# Altium PCB PCB-PWR.PcbDoc (part 1 of 2)
Units mm, origin at the board's own origin, x right, y up, seen from the top; angles counter-clockwise.
Board outline 152.4 x 101.6 mm, 20 copper layers (F.Cu, F.Mask, B.Cu, B.Mask, In1.Cu, F.SilkS, In2.Cu, B.SilkS, F.Adhes, B.Adhes, F.Paste, B.Paste, Dwgs.User, Cmts.User, Eco1.User, Eco2.User, Edge.Cuts, Margin, B.CrtYd, F.CrtYd); 66 components, 31 nets, 210 pads, 267 vias.
Unrouted connection lines stored in the file: 6.
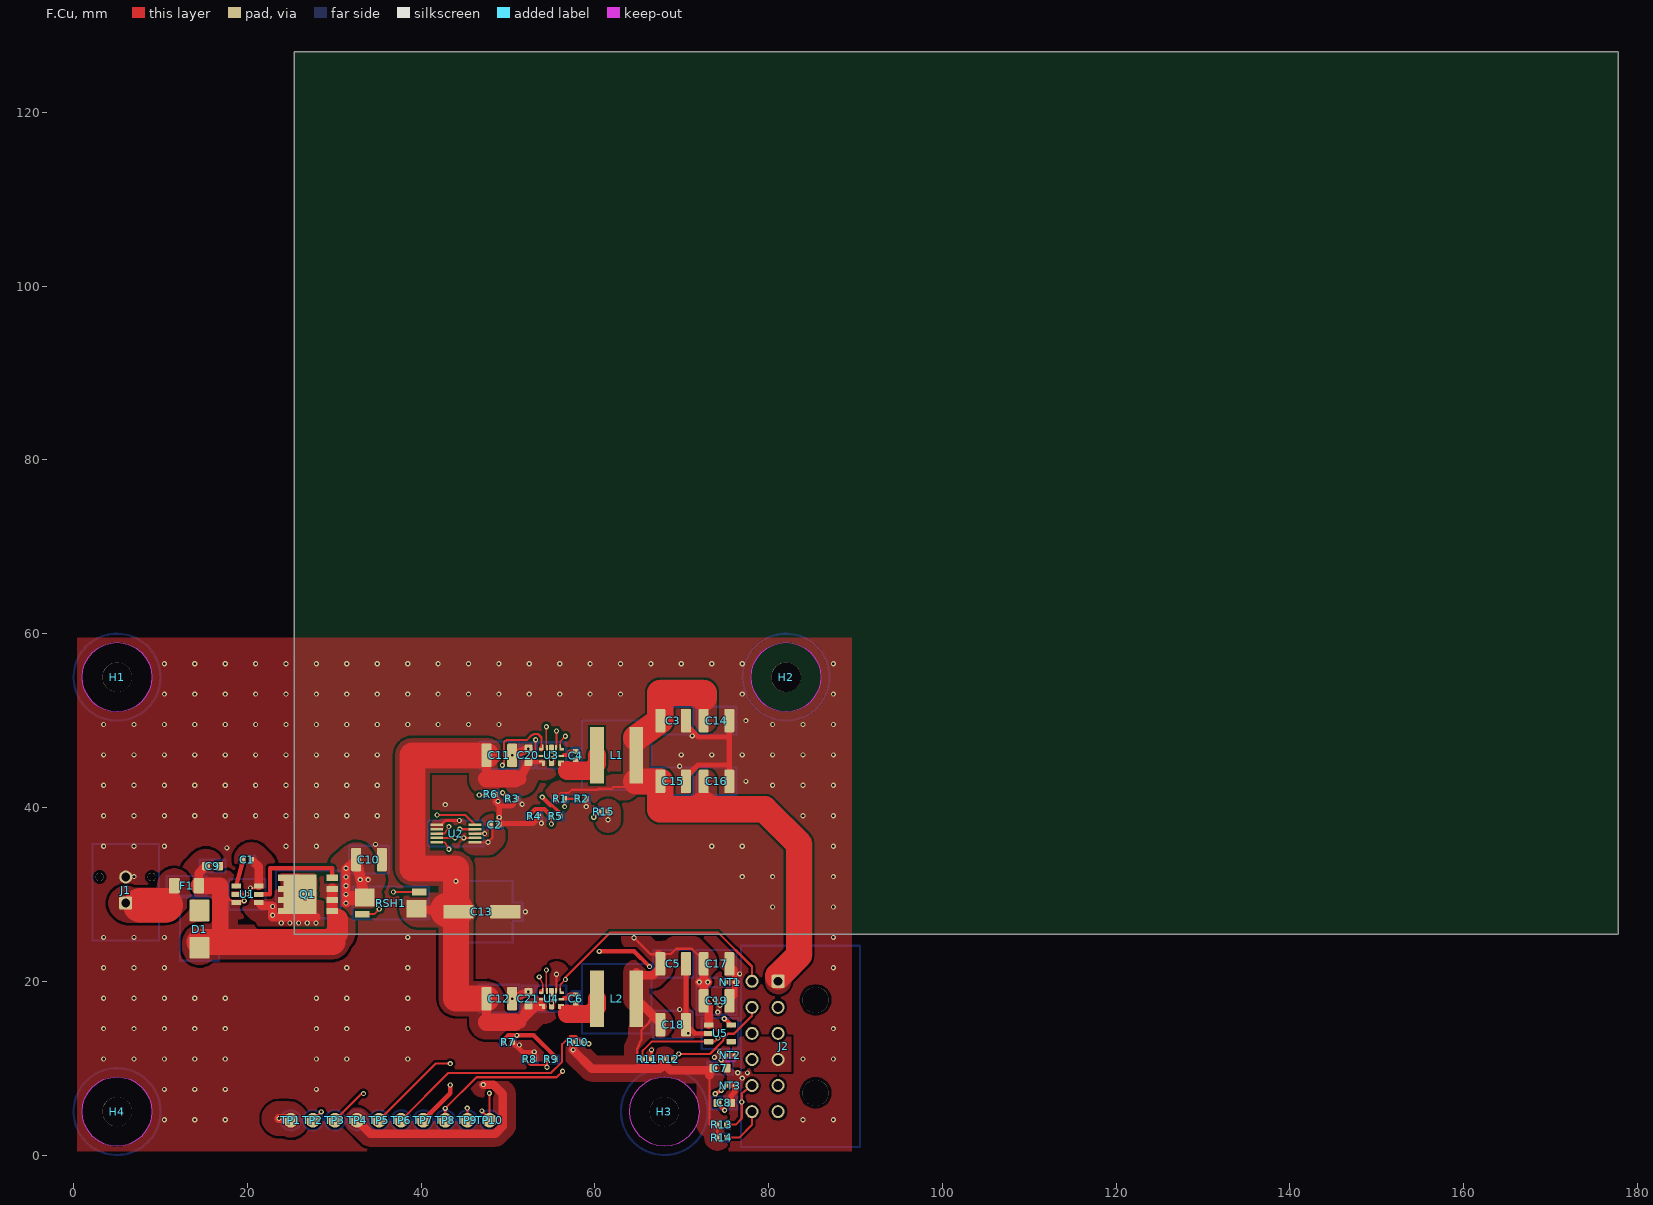
[diagram p0: F.Cu view]
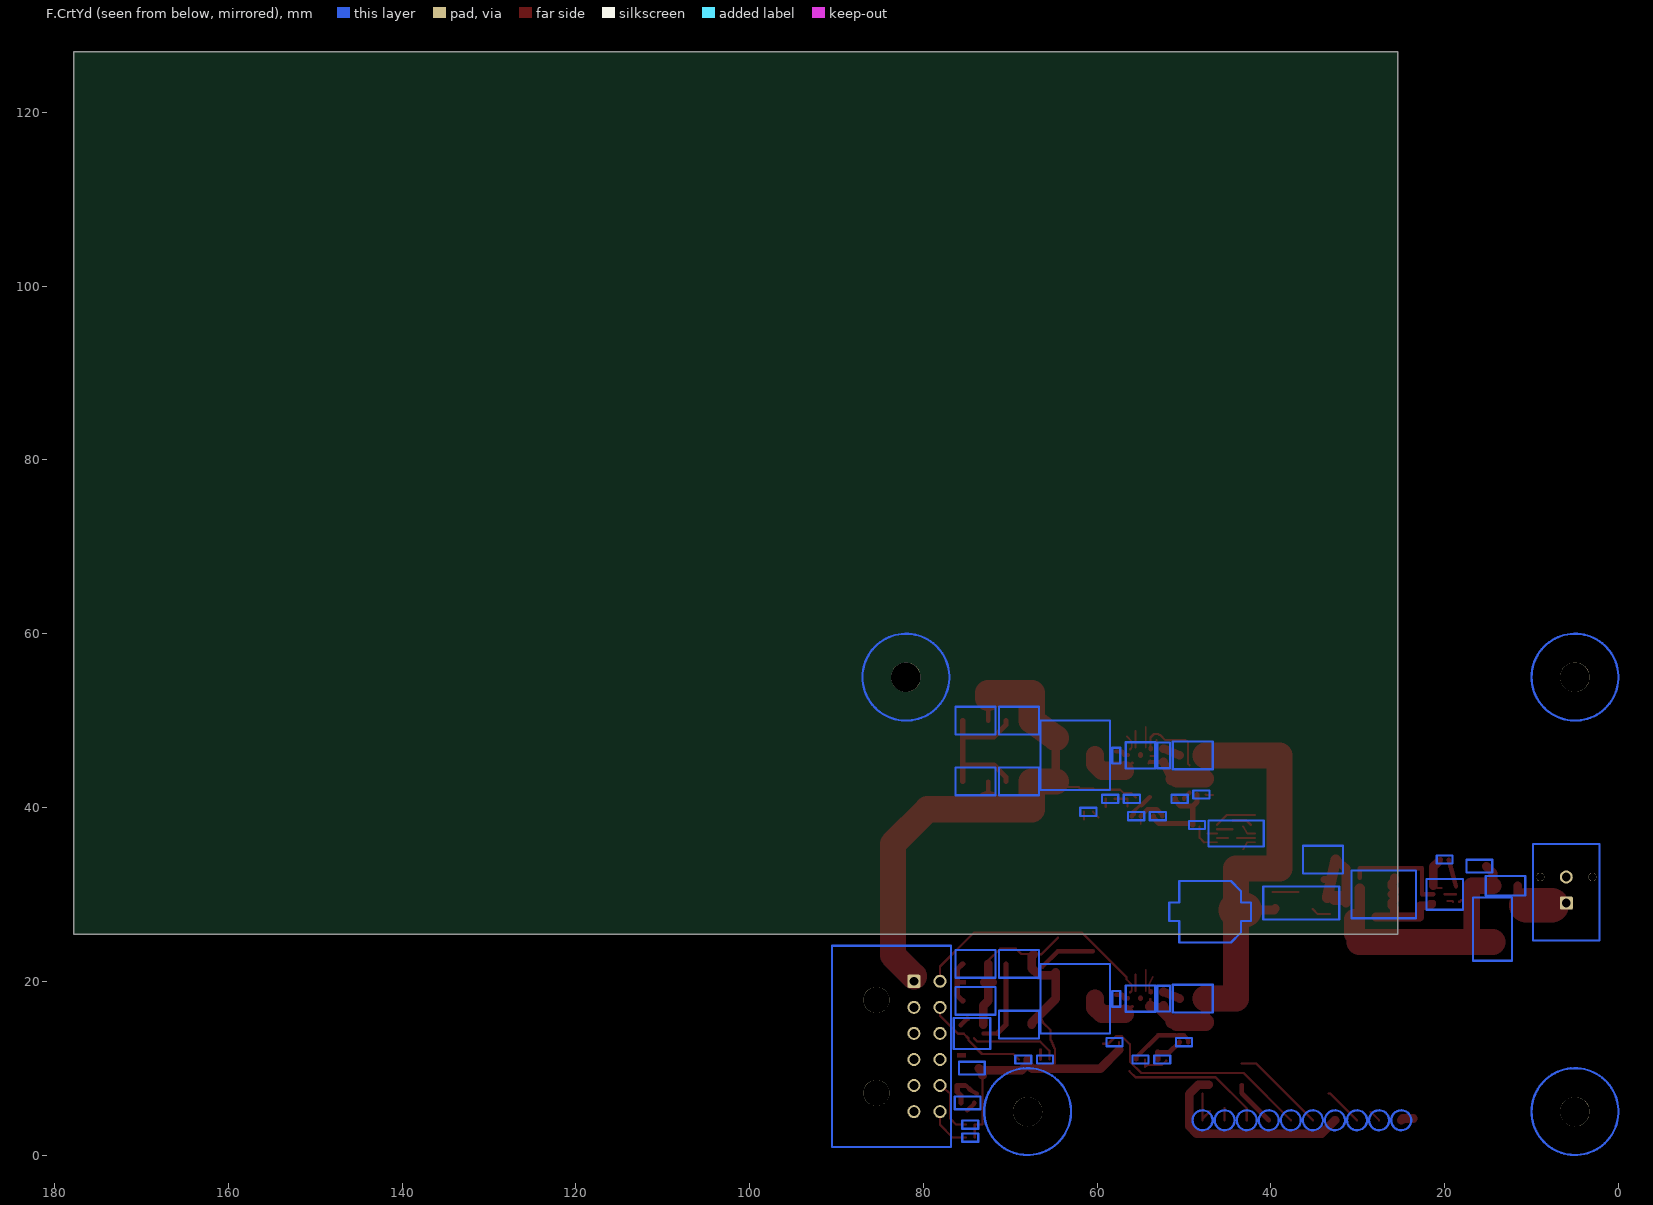
[diagram p1: F.CrtYd view, seen from below]
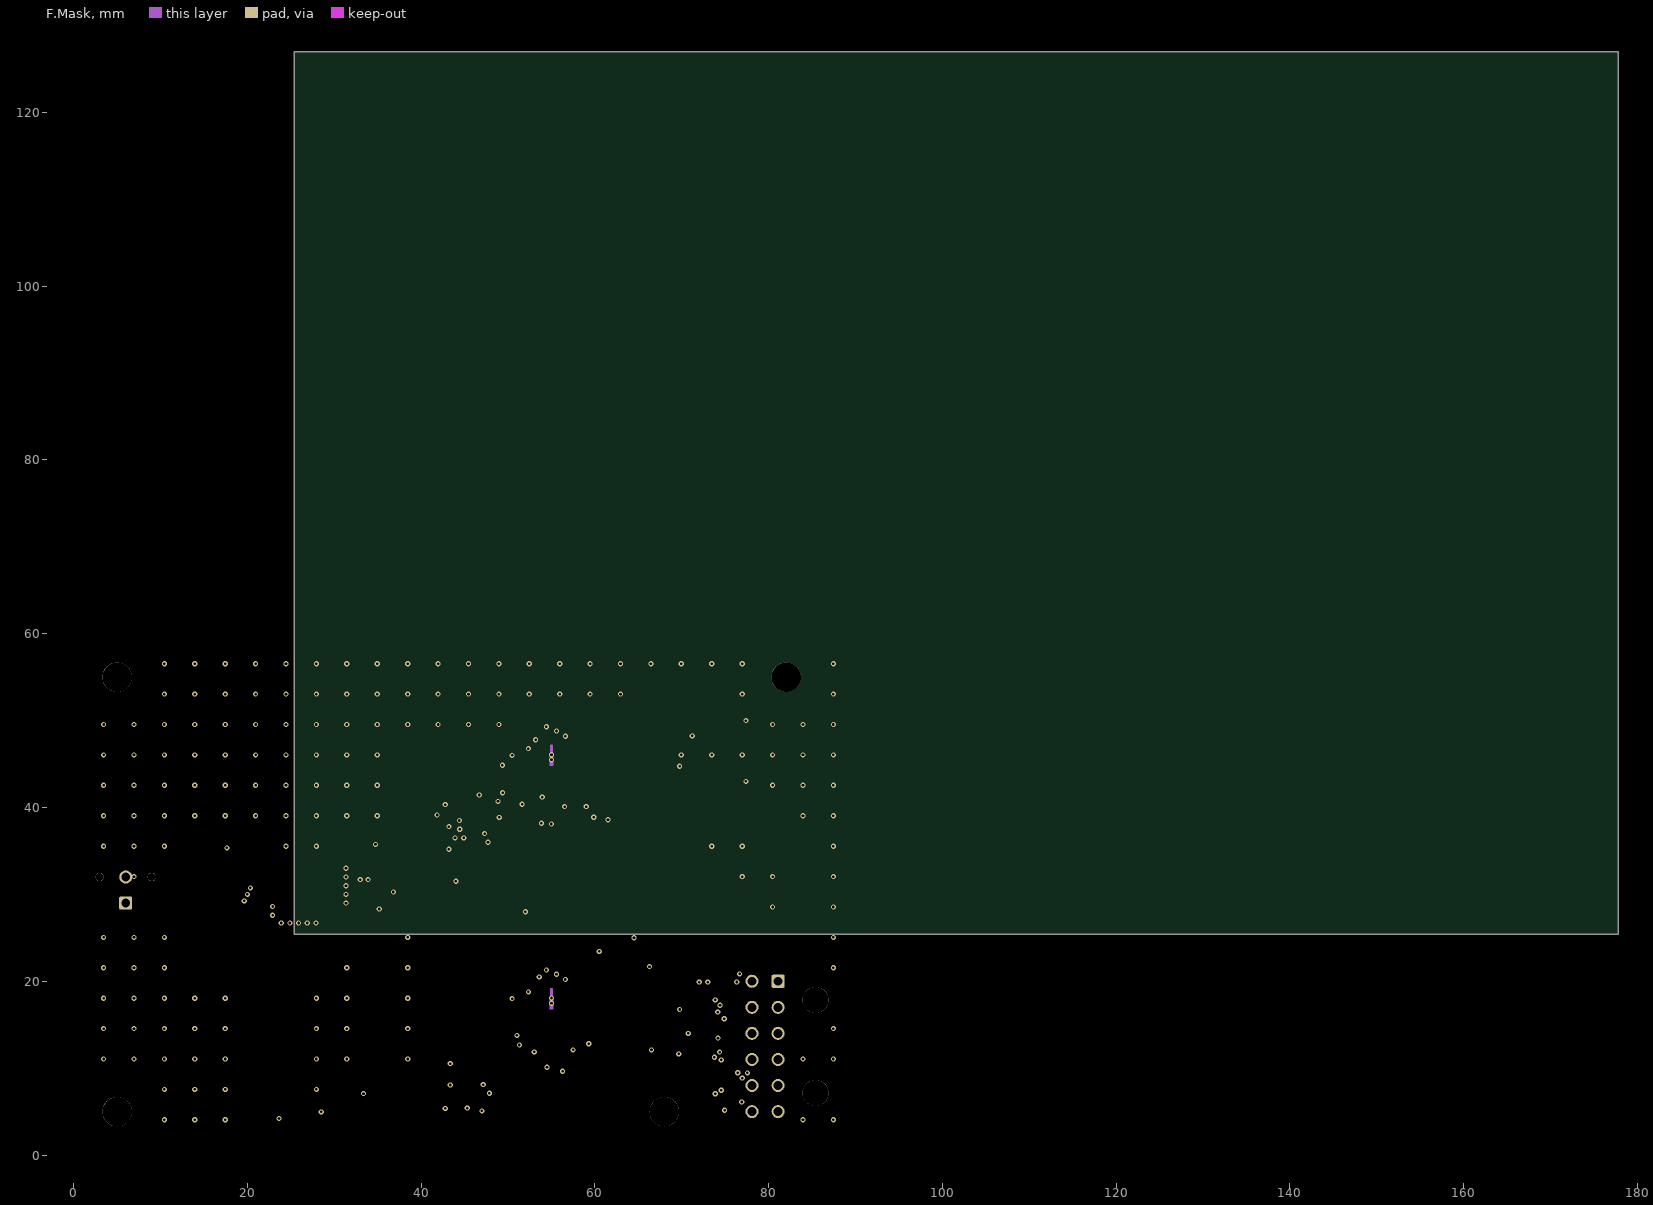
[diagram p2: F.Mask]
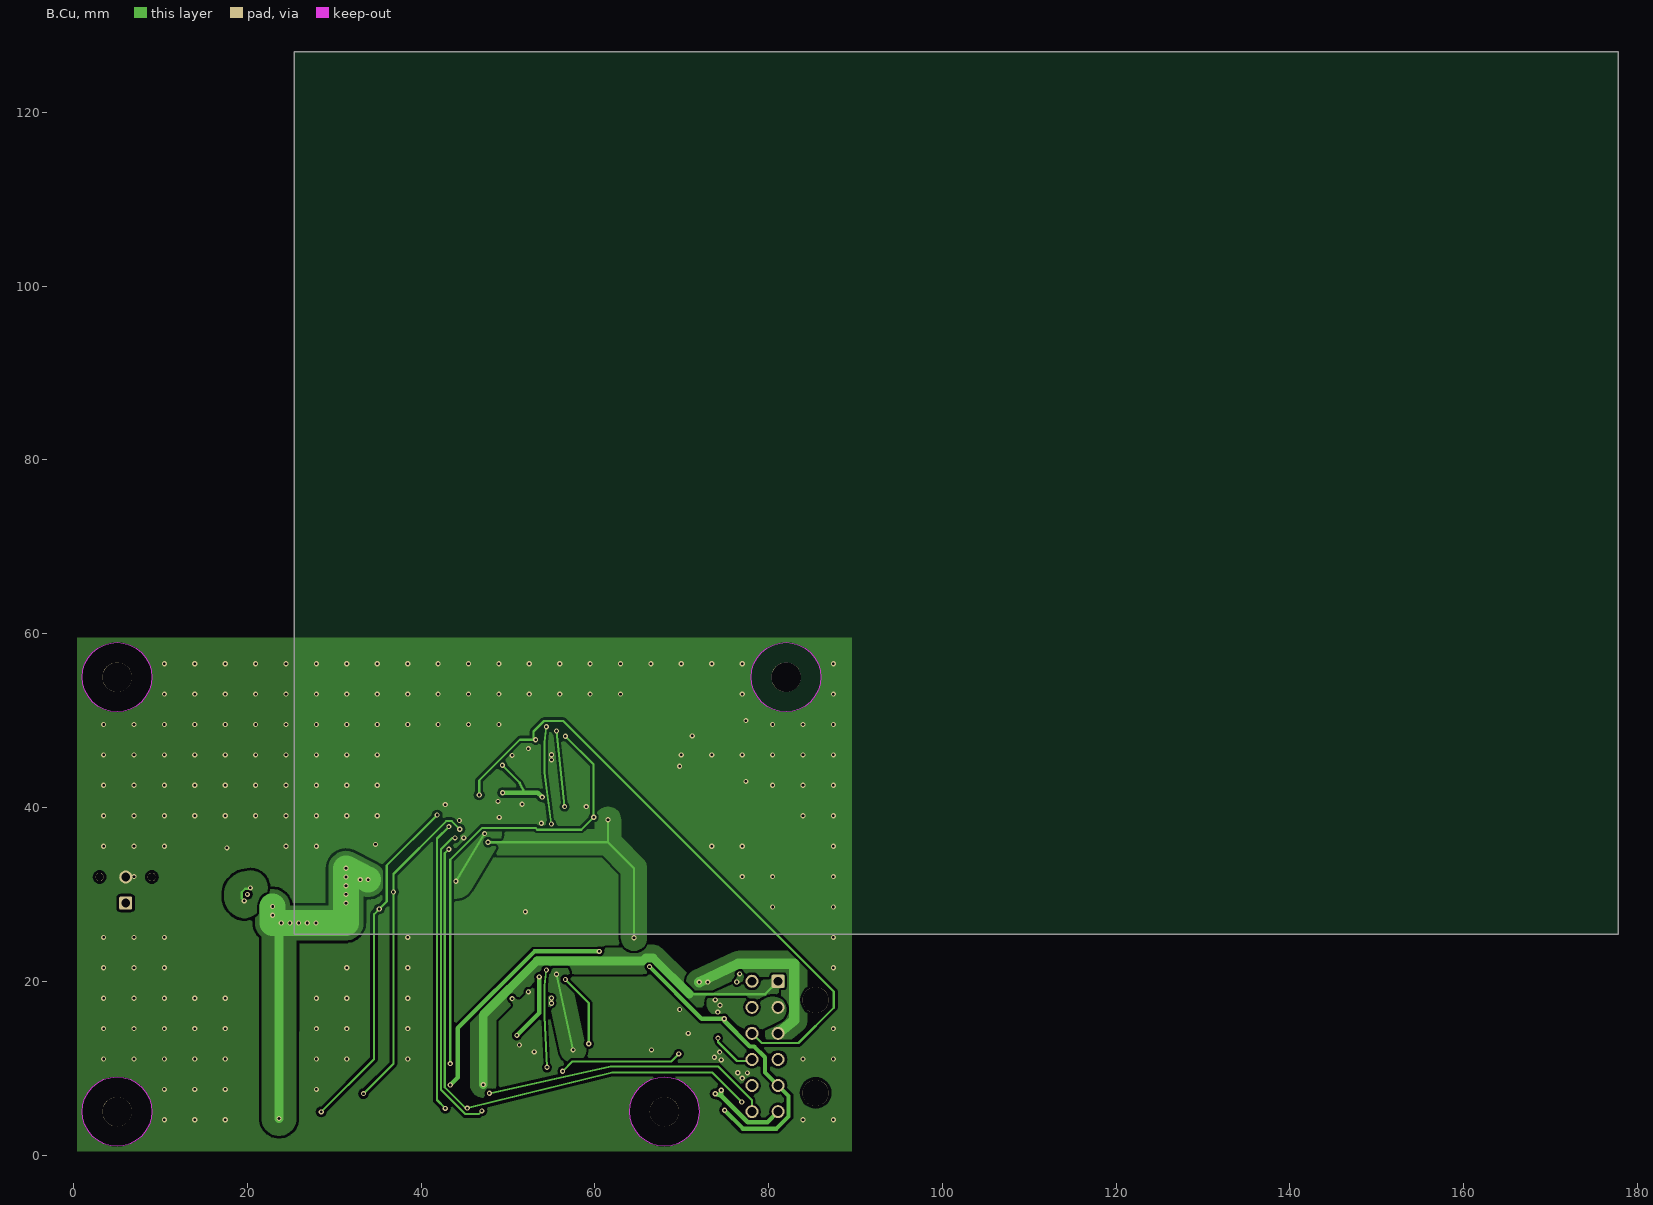
[diagram p3: B.Cu]
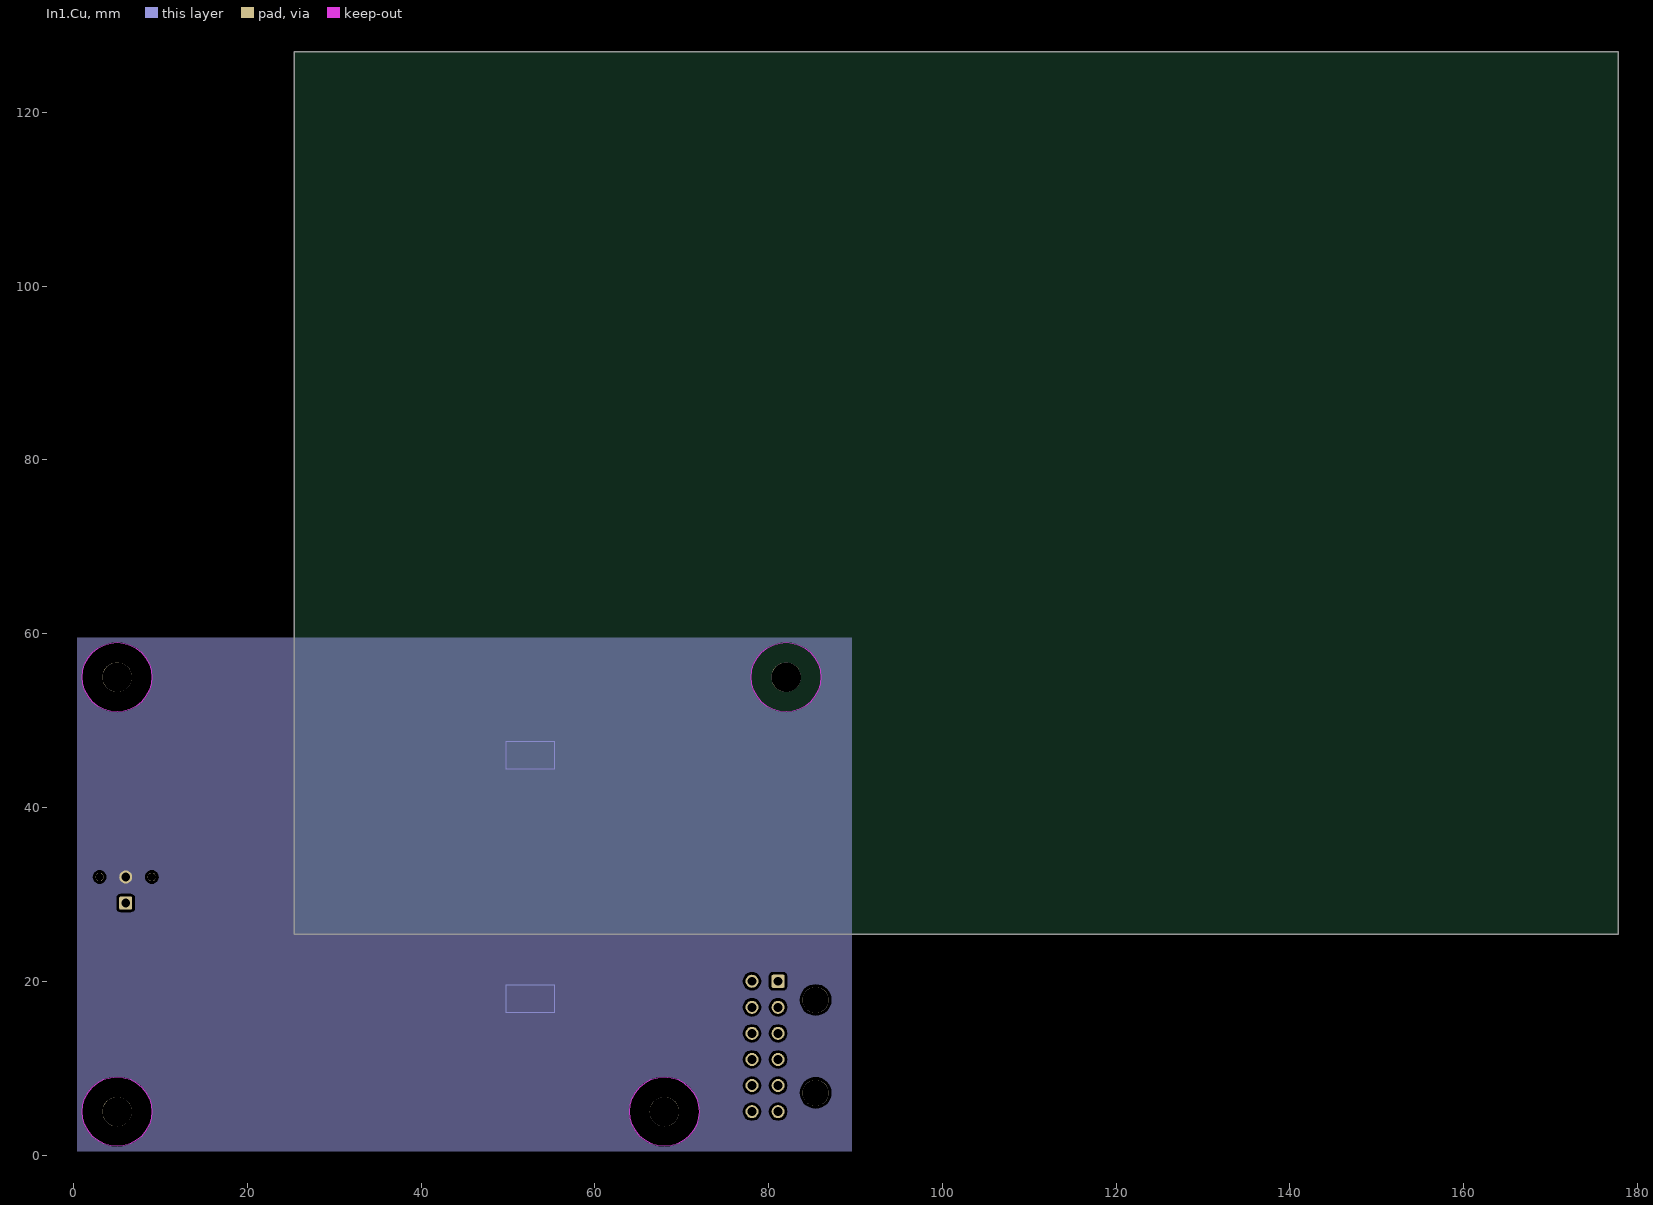
[diagram p4: In1.Cu]
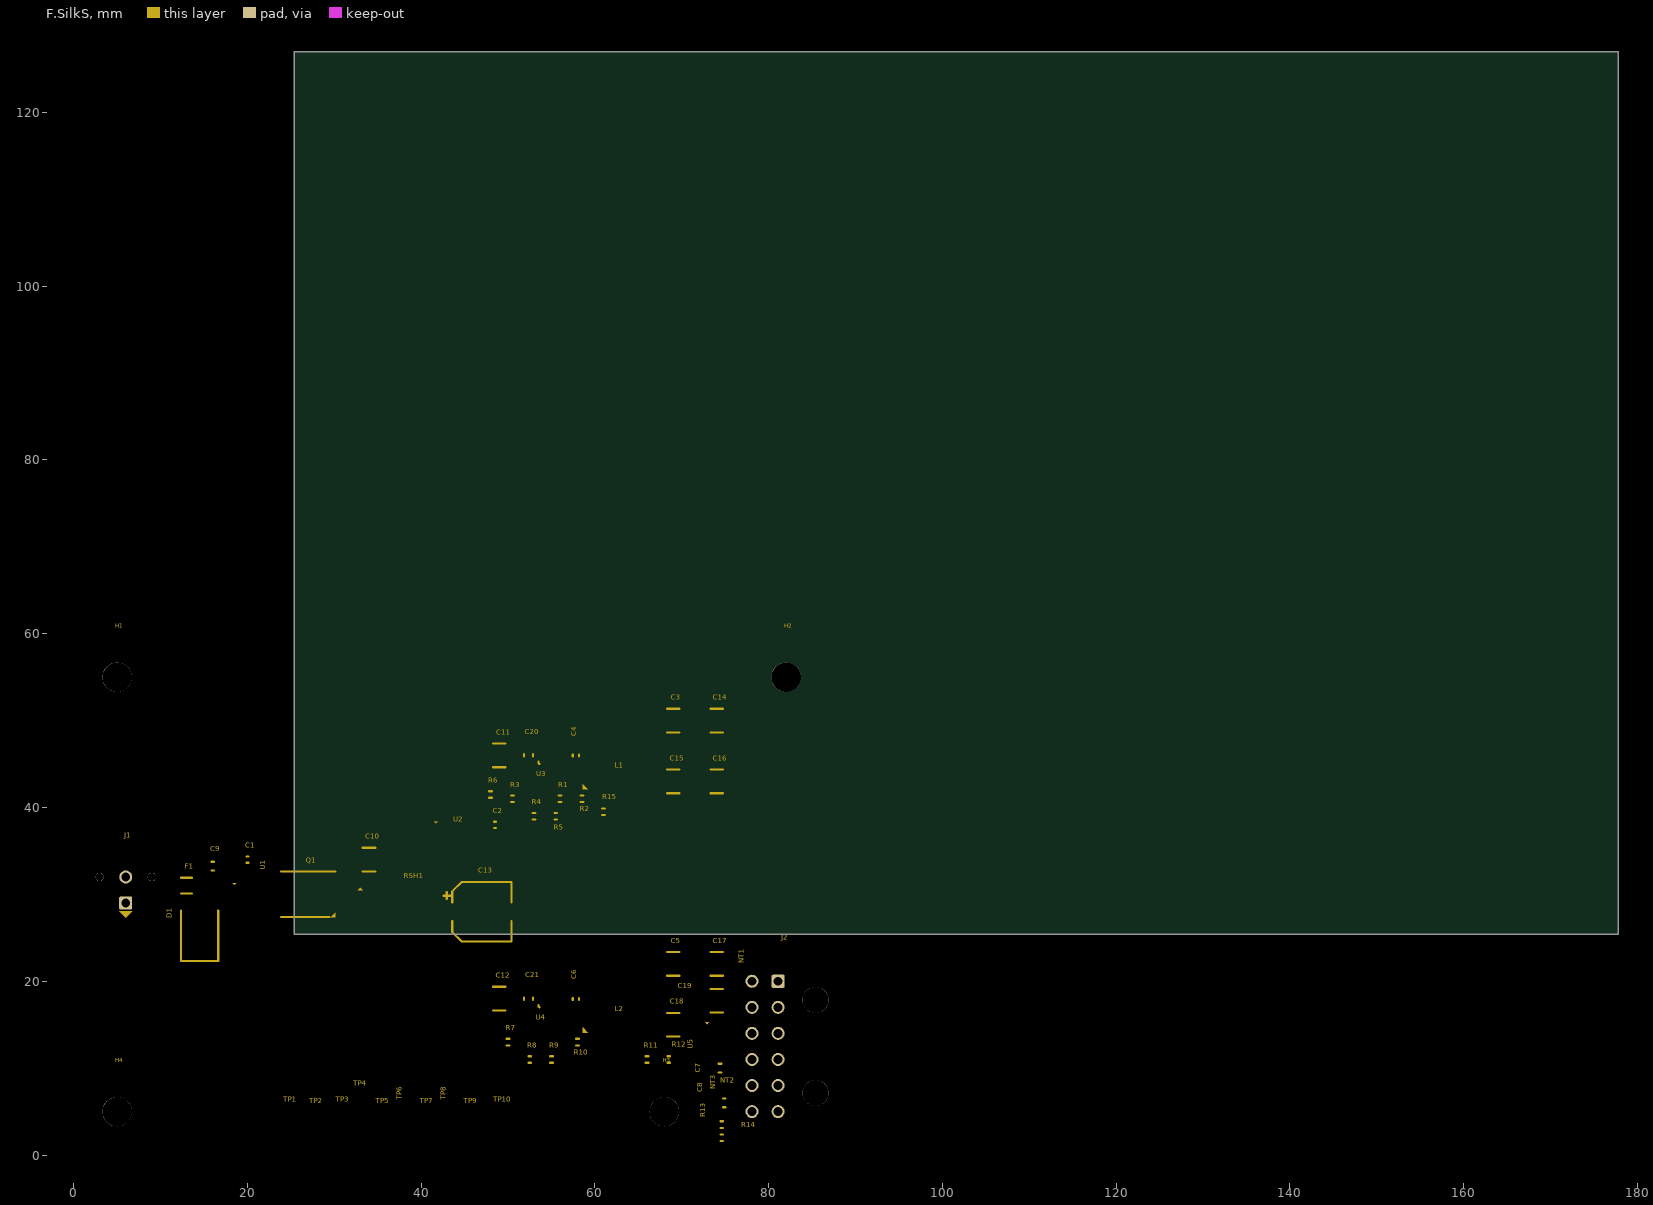
[diagram p5: F.SilkS]
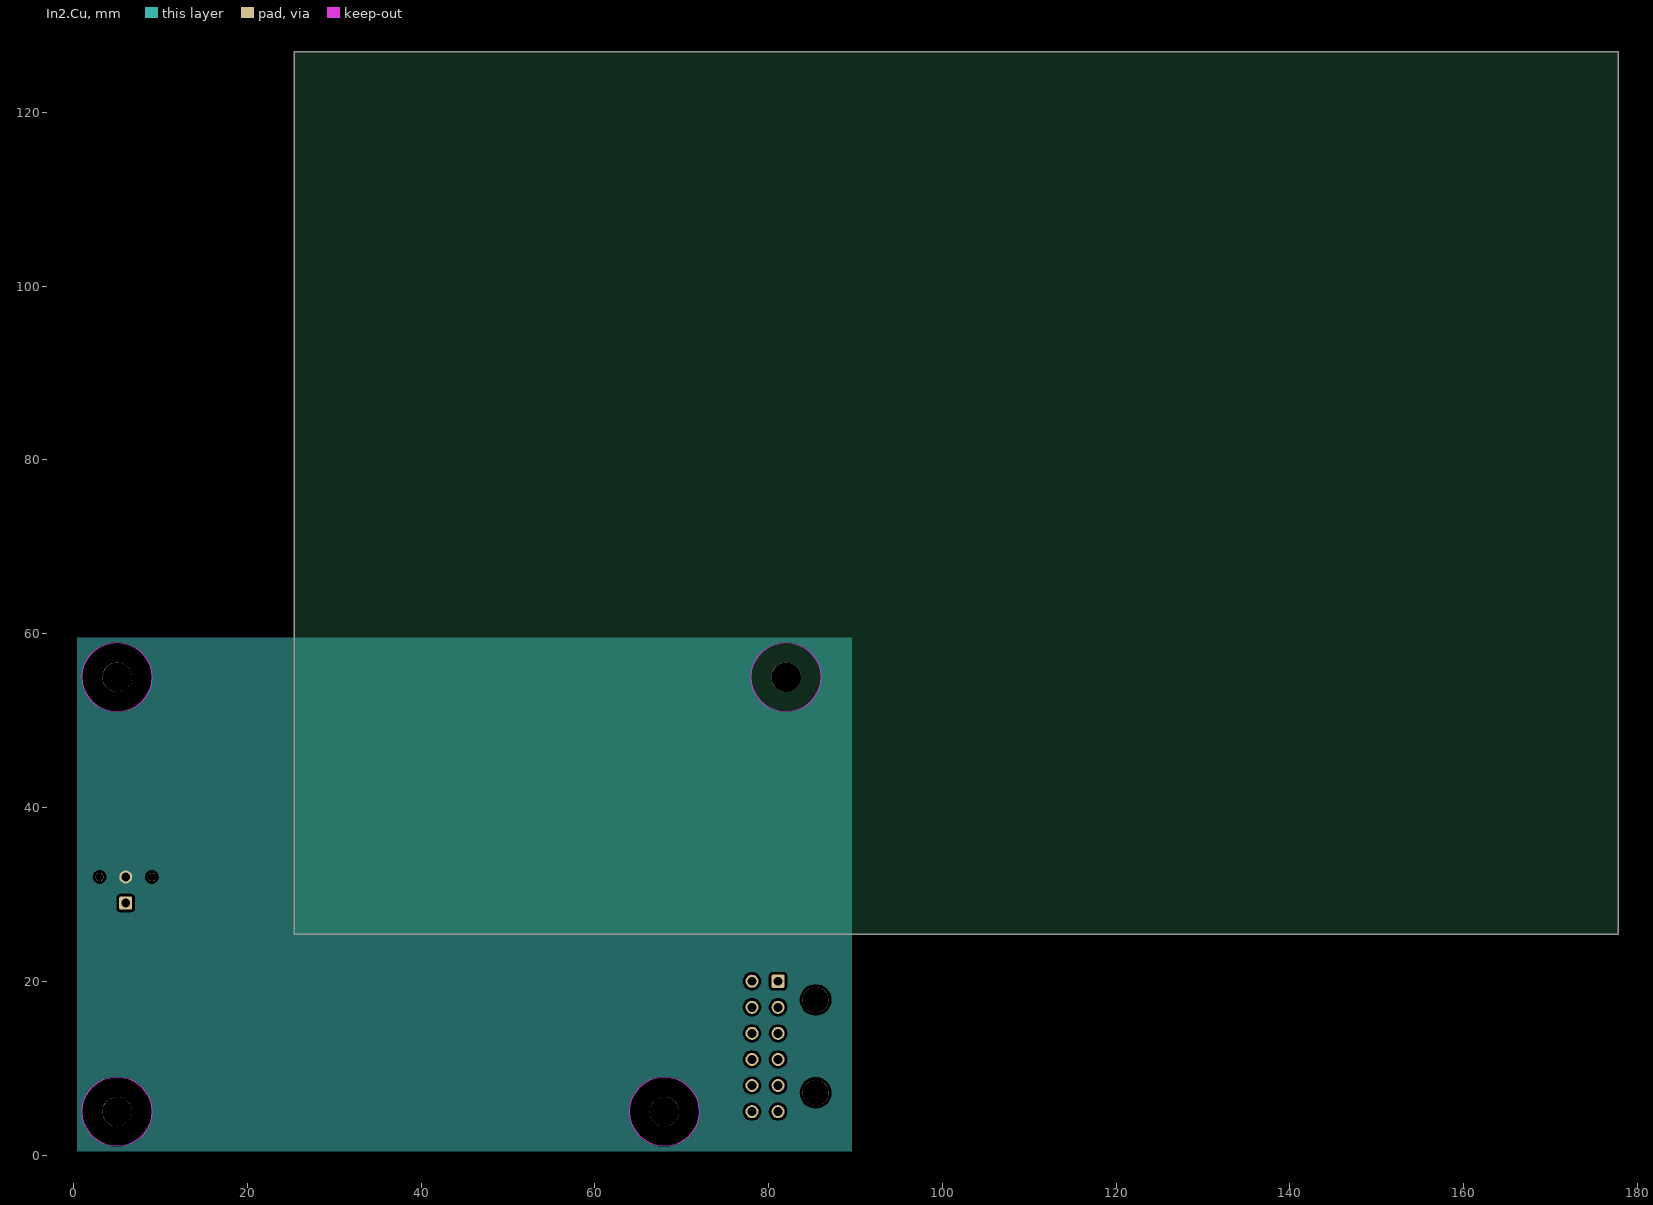
[diagram p6: In2.Cu]
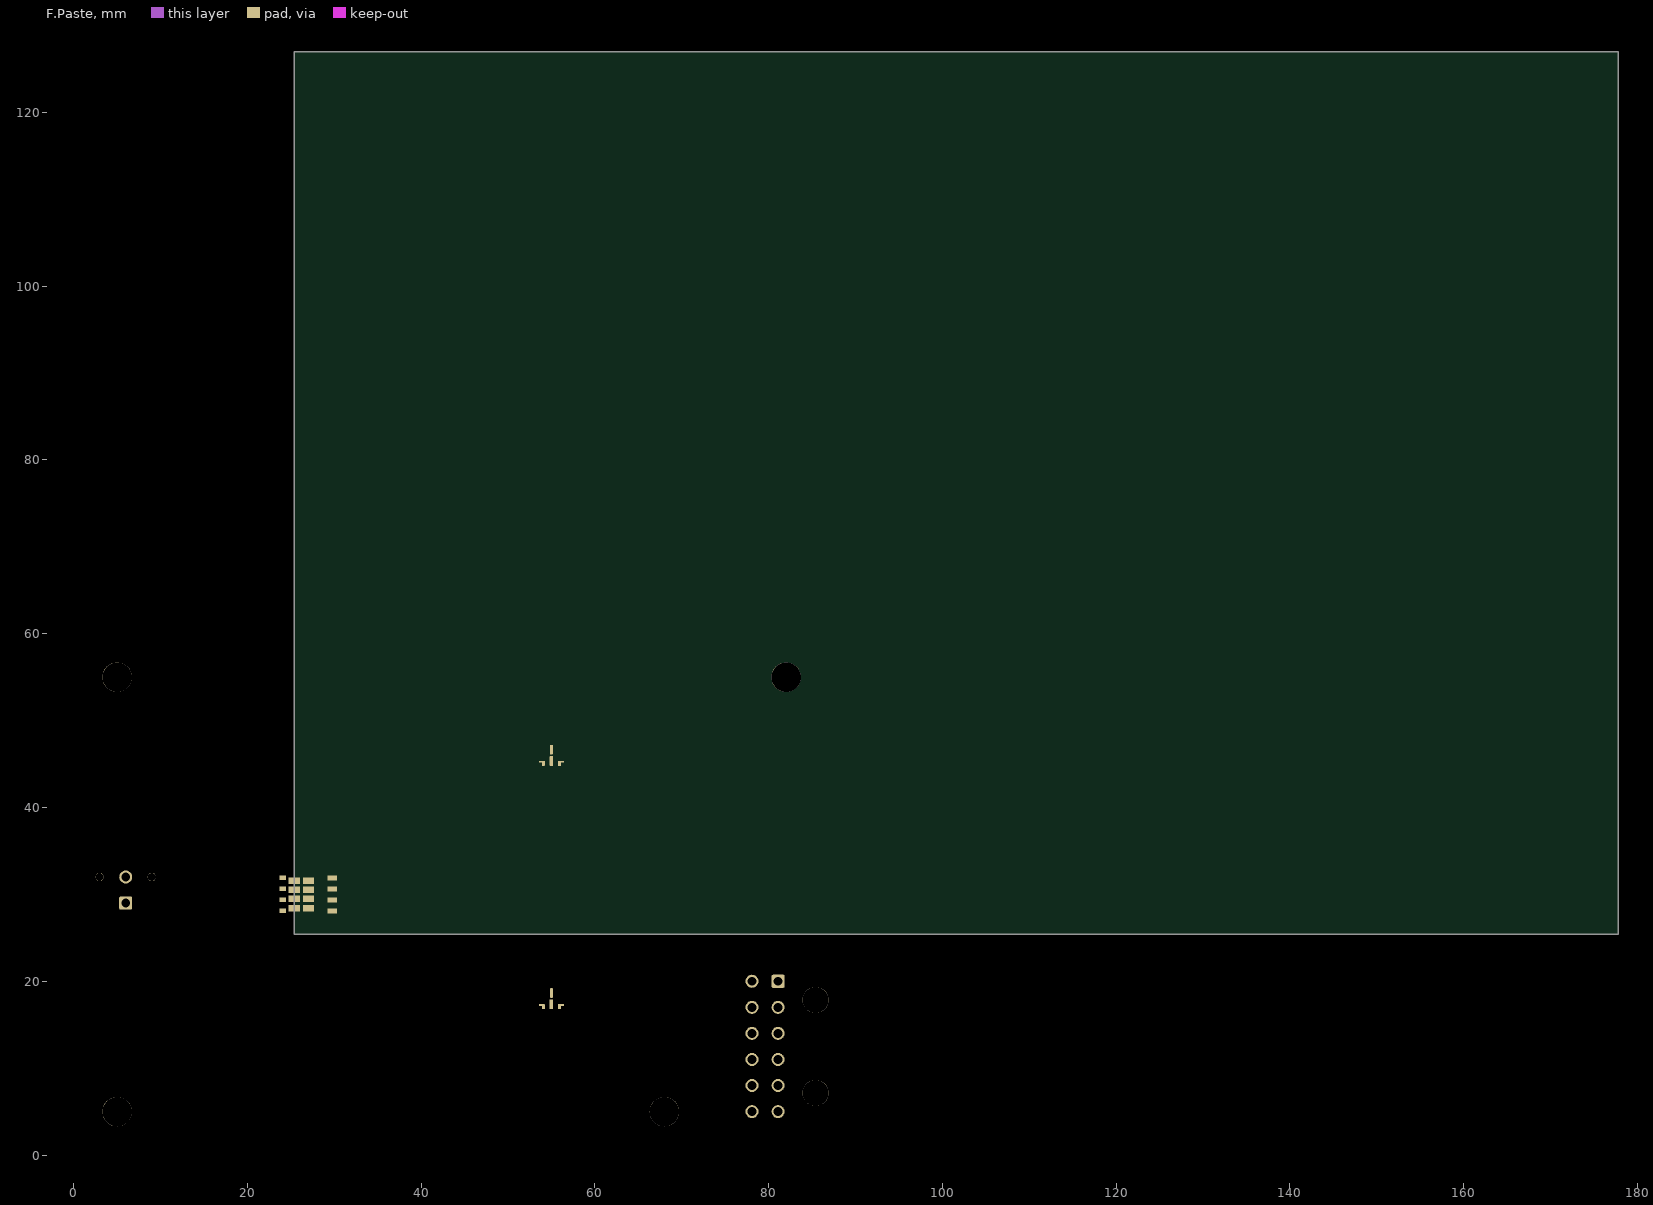
[diagram p7: F.Paste]
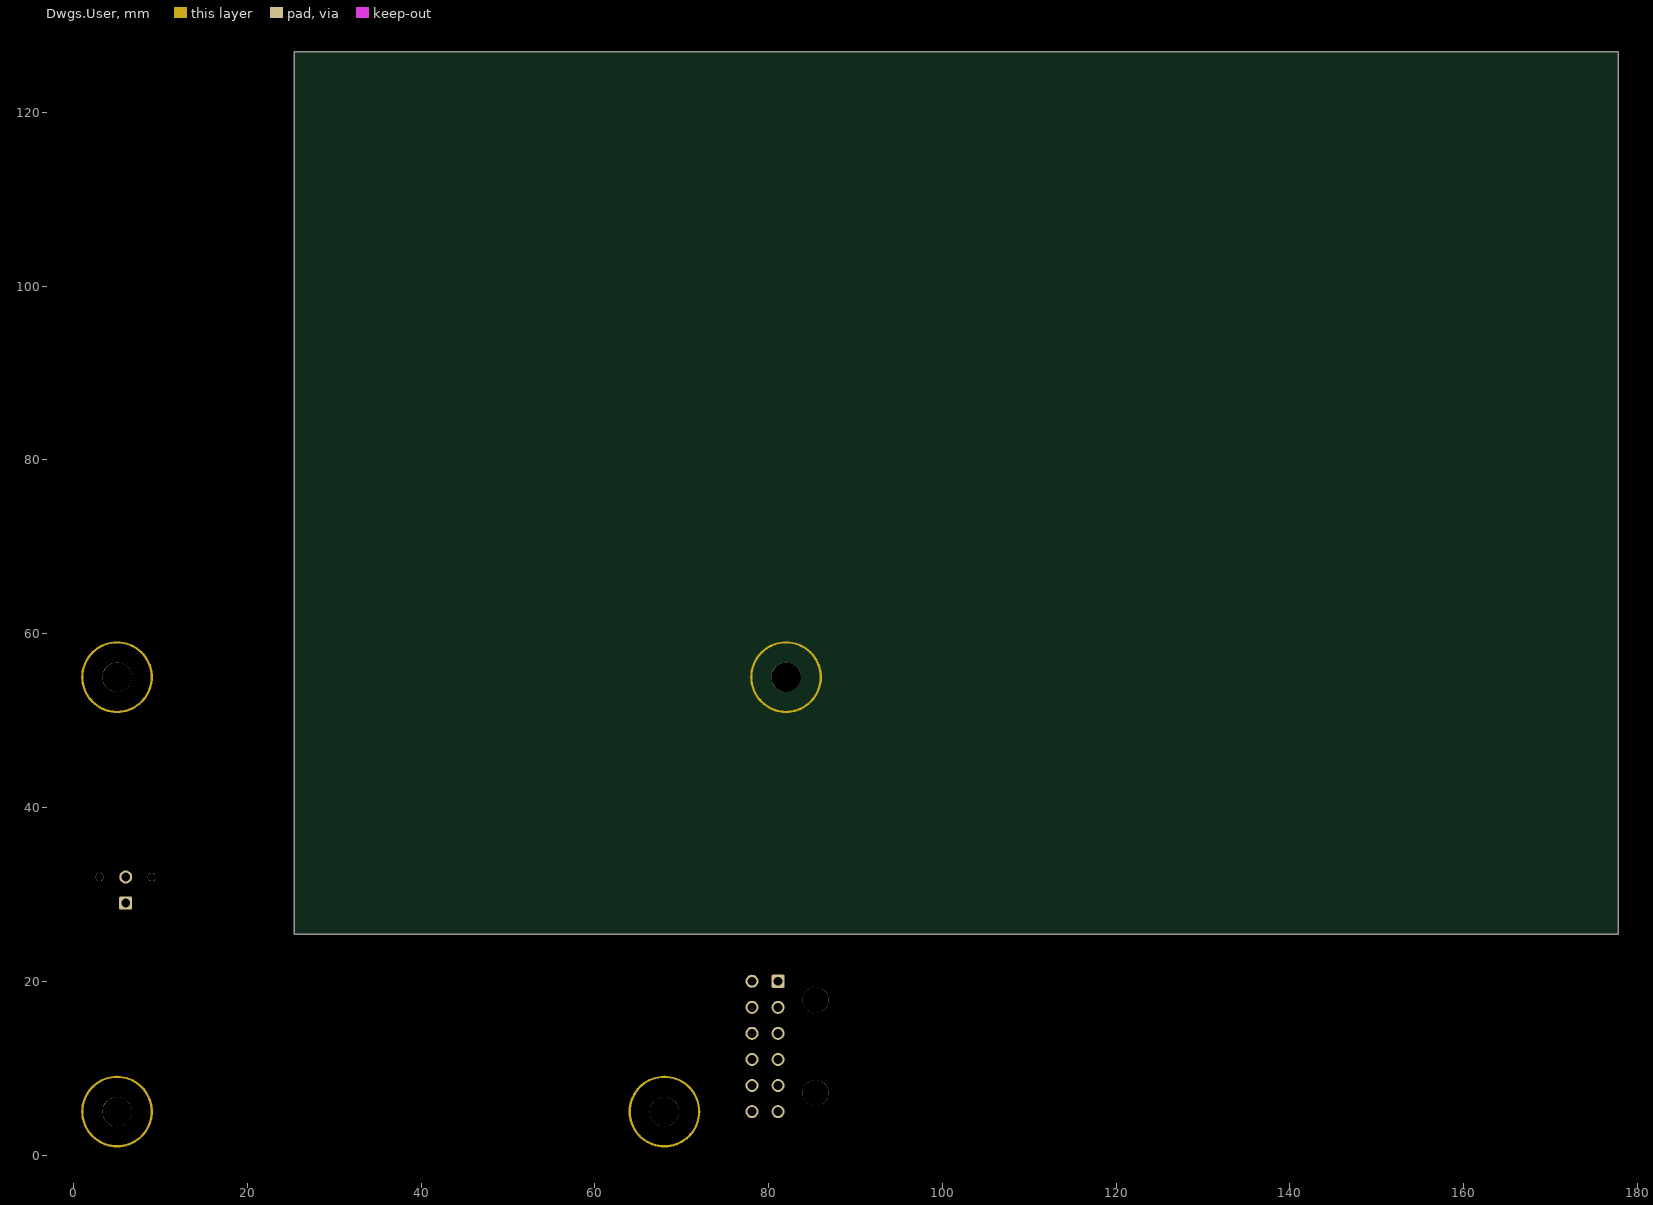
[diagram p8: Dwgs.User]
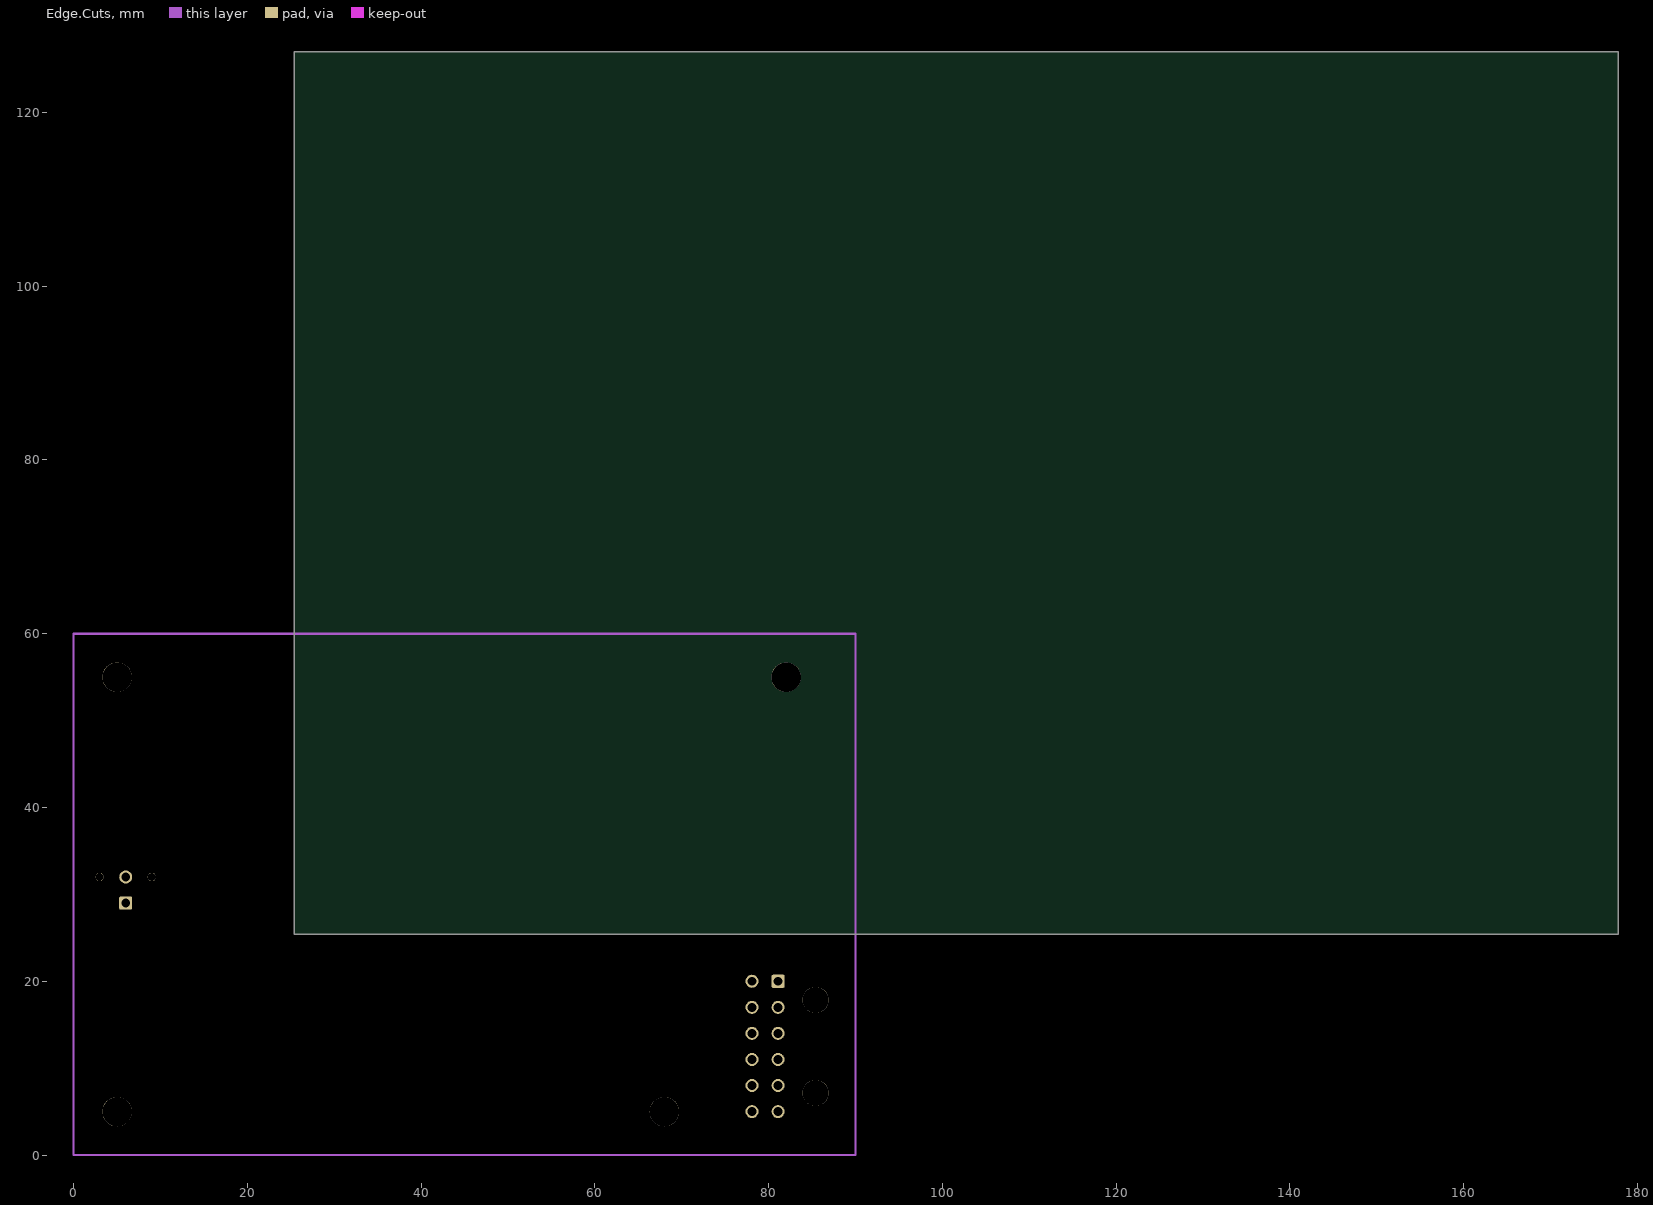
[diagram p9: Edge.Cuts]

## Layer stack, top to bottom
Top Solder: solder mask 0.0102, Solder Resist, Dk 3.5
F.Cu: signal copper 0.0356
Dielectric 1: dielectric 0.32, FR-4, Dk 4.8
F.Mask: signal copper 0.0356
Dielectric2: dielectric 0.32, FR-4, Dk 4.8
B.Cu: signal copper 0.0356
Dielectric3: dielectric 0.32, FR-4, Dk 4.8
B.Mask: signal copper 0.0356
Dielectric4: dielectric 0.32, FR-4, Dk 4.8
In1.Cu: signal copper 0.0356
Dielectric5: dielectric 0.32, FR-4, Dk 4.8
F.SilkS: signal copper 0.0356
Dielectric6: dielectric 0.32, FR-4, Dk 4.8
In2.Cu: signal copper 0.0356
Dielectric7: dielectric 0.32, FR-4, Dk 4.8
B.SilkS: signal copper 0.0356
Dielectric8: dielectric 0.32, FR-4, Dk 4.8
F.Adhes: signal copper 0.0356
Dielectric9: dielectric 0.32, FR-4, Dk 4.8
B.Adhes: signal copper 0.0356
Dielectric10: dielectric 0.32, FR-4, Dk 4.8
F.Paste: signal copper 0.0356
Dielectric11: dielectric 0.32, FR-4, Dk 4.8
B.Paste: signal copper 0.0356
Dielectric12: dielectric 0.32, FR-4, Dk 4.8
Dwgs.User: signal copper 0.0356
Dielectric13: dielectric 0.32, FR-4, Dk 4.8
Cmts.User: signal copper 0.0356
Dielectric14: dielectric 0.32, FR-4, Dk 4.8
Eco1.User: signal copper 0.0356
Dielectric15: dielectric 0.32, FR-4, Dk 4.8
Eco2.User: signal copper 0.0356
Dielectric16: dielectric 0.32, FR-4, Dk 4.8
Edge.Cuts: signal copper 0.0356
Dielectric17: dielectric 0.32, FR-4, Dk 4.8
Margin: signal copper 0.0356
Dielectric18: dielectric 0.32, FR-4, Dk 4.8
B.CrtYd: signal copper 0.0356
Dielectric19: dielectric 0.32, FR-4, Dk 4.8
F.CrtYd: signal copper 0.0356
Bottom Solder: solder mask 0.0102, Solder Resist, Dk 3.5

## Board outline
25.4,25.4 177.8,25.4 177.8,127 25.4,127

## Design rules (kind name [scope] priority, off if disabled: settings)
Clearance "Clearence 2,3_PadClass" [InPadClass('Pad Class Clearance 2,3')] p1: gap=2.3 ignorepadtopadclearanceinfootprint=FALSE
Clearance "Clearence 0,3_Polygon" [InNamedPolygon('F.Cu-3V3_DIGITAL') OR InNamedPolygon('F.Cu-VBAT_SYS') OR InNamedPolygon('F.Cu-3V8_MODEM') OR InNamedPolygon('F.Cu-VBAT_PROTECTED') OR InNamedPolygon('F.Cu-VBAT_PROTECTED-1') OR InNamedPolygon('F.Cu-3V3_DIGITAL-1') OR InNamedPolygon('F.Cu-GND_MODEM') OR InNamedPolygon('F.Cu-3V3_DIGITAL-2') OR InNamedPolygon('F.Cu-GND_DIGITAL') OR InNamedPolygon('F.Cu-VBAT_FUSED') OR InNamedPolygon('F.Cu-3V8_MODEM-1') OR InNamedPolygon('F.Cu-GND_PWR') OR InNamedPolygon('F.Cu-3V3_DIGITAL-3') OR InNamedPolygon('F.Cu-VBAT_SYS-1') OR InNamedPolygon('F.Cu-VBAT_RAW') OR InNamedPolygon('B.Cu-3V3_DIGITAL') OR InNamedPolygon('B.Cu-3V3_DIGITAL-1') OR InNamedPolygon('B.Cu-GND_MODEM') OR InNamedPolygon('B.Cu-GND_PWR') OR InNamedPolygon('B.Cu-VBAT_PROTECTED') OR InNamedPolygon('B.Cu-VBAT_SYS') OR InNamedPolygon('B.Cu-3V8_MODEM') OR InNamedPolygon('B.Cu-3V3_DIGITAL-2') OR InNamedPolygon('B.Cu-VBAT_FUSED') OR InNamedPolygon('In1.Cu-GND_PWR') OR InNamedPolygon('In1.Cu-GND_PWR-1') OR InNamedPolygon('In1.Cu-GND_PWR-2') OR InNamedPolygon('In2.Cu-GND_PWR')] p2: gap=0.3 ignorepadtopadclearanceinfootprint=FALSE
MinimumSolderMaskSliver [All] p1: minsoldermaskwidth=0
PolygonConnect Polygon_In2.Cu-GND_PWR_ConnectDirect [IsNamedPolygon('In2.Cu-GND_PWR')] p1: connectstyle=Direct reliefconductorwidth=0.254 reliefentries=4 polygonreliefangle="90 Angle" airgapwidth=0.254
PolygonConnect Polygon_In1.Cu-GND_PWR-2_ConnectDirect [IsNamedPolygon('In1.Cu-GND_PWR-2')] p2: connectstyle=Direct reliefconductorwidth=0.254 reliefentries=4 polygonreliefangle="90 Angle" airgapwidth=0.254
PolygonConnect Polygon_In1.Cu-GND_PWR-1_ConnectDirect [IsNamedPolygon('In1.Cu-GND_PWR-1')] p3: connectstyle=Direct reliefconductorwidth=0.254 reliefentries=4 polygonreliefangle="90 Angle" airgapwidth=0.254
PolygonConnect Polygon_In1.Cu-GND_PWR_ConnectDirect [IsNamedPolygon('In1.Cu-GND_PWR')] p4: connectstyle=Direct reliefconductorwidth=0.254 reliefentries=4 polygonreliefangle="90 Angle" airgapwidth=0.254
PolygonConnect Polygon_B.Cu-VBAT_FUSED_ConnectDirect [IsNamedPolygon('B.Cu-VBAT_FUSED')] p5: connectstyle=Direct reliefconductorwidth=0.254 reliefentries=4 polygonreliefangle="90 Angle" airgapwidth=0.254
PolygonConnect Polygon_B.Cu-3V3_DIGITAL-2_ConnectDirect [IsNamedPolygon('B.Cu-3V3_DIGITAL-2')] p6: connectstyle=Direct reliefconductorwidth=0.254 reliefentries=4 polygonreliefangle="90 Angle" airgapwidth=0.254
PolygonConnect Polygon_B.Cu-3V8_MODEM_ConnectDirect [IsNamedPolygon('B.Cu-3V8_MODEM')] p7: connectstyle=Direct reliefconductorwidth=0.254 reliefentries=4 polygonreliefangle="90 Angle" airgapwidth=0.254
PolygonConnect Polygon_B.Cu-VBAT_SYS_ConnectDirect [IsNamedPolygon('B.Cu-VBAT_SYS')] p8: connectstyle=Direct reliefconductorwidth=0.254 reliefentries=4 polygonreliefangle="90 Angle" airgapwidth=0.254
PolygonConnect Polygon_B.Cu-VBAT_PROTECTED_ConnectDirect [IsNamedPolygon('B.Cu-VBAT_PROTECTED')] p9: connectstyle=Direct reliefconductorwidth=0.254 reliefentries=4 polygonreliefangle="90 Angle" airgapwidth=0.254
PolygonConnect Polygon_B.Cu-GND_PWR_ConnectDirect [IsNamedPolygon('B.Cu-GND_PWR')] p10: connectstyle=Direct reliefconductorwidth=0.254 reliefentries=4 polygonreliefangle="90 Angle" airgapwidth=0.254
PolygonConnect Polygon_B.Cu-GND_MODEM_ConnectDirect [IsNamedPolygon('B.Cu-GND_MODEM')] p11: connectstyle=Direct reliefconductorwidth=0.254 reliefentries=4 polygonreliefangle="90 Angle" airgapwidth=0.254
PolygonConnect Polygon_B.Cu-3V3_DIGITAL-1_ConnectDirect [IsNamedPolygon('B.Cu-3V3_DIGITAL-1')] p12: connectstyle=Direct reliefconductorwidth=0.254 reliefentries=4 polygonreliefangle="90 Angle" airgapwidth=0.254
PolygonConnect Polygon_B.Cu-3V3_DIGITAL_ConnectDirect [IsNamedPolygon('B.Cu-3V3_DIGITAL')] p13: connectstyle=Direct reliefconductorwidth=0.254 reliefentries=4 polygonreliefangle="90 Angle" airgapwidth=0.254
PolygonConnect Polygon_F.Cu-VBAT_RAW_ConnectDirect [IsNamedPolygon('F.Cu-VBAT_RAW')] p14: connectstyle=Direct reliefconductorwidth=0.254 reliefentries=4 polygonreliefangle="90 Angle" airgapwidth=0.254
PolygonConnect Polygon_F.Cu-VBAT_SYS-1_ConnectDirect [IsNamedPolygon('F.Cu-VBAT_SYS-1')] p15: connectstyle=Direct reliefconductorwidth=0.254 reliefentries=4 polygonreliefangle="90 Angle" airgapwidth=0.254
PolygonConnect Polygon_F.Cu-3V3_DIGITAL-3_ConnectDirect [IsNamedPolygon('F.Cu-3V3_DIGITAL-3')] p16: connectstyle=Direct reliefconductorwidth=0.254 reliefentries=4 polygonreliefangle="90 Angle" airgapwidth=0.254
PolygonConnect Polygon_F.Cu-GND_PWR_ConnectDirect [IsNamedPolygon('F.Cu-GND_PWR')] p17: connectstyle=Direct reliefconductorwidth=0.254 reliefentries=4 polygonreliefangle="90 Angle" airgapwidth=0.254
PolygonConnect Polygon_F.Cu-3V8_MODEM-1_ConnectDirect [IsNamedPolygon('F.Cu-3V8_MODEM-1')] p18: connectstyle=Direct reliefconductorwidth=0.254 reliefentries=4 polygonreliefangle="90 Angle" airgapwidth=0.254
PolygonConnect Polygon_F.Cu-VBAT_FUSED_ConnectDirect [IsNamedPolygon('F.Cu-VBAT_FUSED')] p19: connectstyle=Direct reliefconductorwidth=0.254 reliefentries=4 polygonreliefangle="90 Angle" airgapwidth=0.254
PolygonConnect Polygon_F.Cu-GND_DIGITAL_ConnectDirect [IsNamedPolygon('F.Cu-GND_DIGITAL')] p20: connectstyle=Direct reliefconductorwidth=0.254 reliefentries=4 polygonreliefangle="90 Angle" airgapwidth=0.254
PolygonConnect Polygon_F.Cu-3V3_DIGITAL-2_ConnectDirect [IsNamedPolygon('F.Cu-3V3_DIGITAL-2')] p21: connectstyle=Direct reliefconductorwidth=0.254 reliefentries=4 polygonreliefangle="90 Angle" airgapwidth=0.254
PolygonConnect Polygon_F.Cu-GND_MODEM_ConnectDirect [IsNamedPolygon('F.Cu-GND_MODEM')] p22: connectstyle=Direct reliefconductorwidth=0.254 reliefentries=4 polygonreliefangle="90 Angle" airgapwidth=0.254
PolygonConnect Polygon_F.Cu-3V3_DIGITAL-1_ConnectDirect [IsNamedPolygon('F.Cu-3V3_DIGITAL-1')] p23: connectstyle=Direct reliefconductorwidth=0.254 reliefentries=4 polygonreliefangle="90 Angle" airgapwidth=0.254
PolygonConnect Polygon_F.Cu-VBAT_PROTECTED-1_ConnectDirect [IsNamedPolygon('F.Cu-VBAT_PROTECTED-1')] p24: connectstyle=Direct reliefconductorwidth=0.254 reliefentries=4 polygonreliefangle="90 Angle" airgapwidth=0.254
PolygonConnect Polygon_F.Cu-VBAT_PROTECTED_ConnectDirect [IsNamedPolygon('F.Cu-VBAT_PROTECTED')] p25: connectstyle=Direct reliefconductorwidth=0.254 reliefentries=4 polygonreliefangle="90 Angle" airgapwidth=0.254
PolygonConnect Polygon_F.Cu-3V8_MODEM_ConnectDirect [IsNamedPolygon('F.Cu-3V8_MODEM')] p26: connectstyle=Direct reliefconductorwidth=0.254 reliefentries=4 polygonreliefangle="90 Angle" airgapwidth=0.254
PolygonConnect Polygon_F.Cu-VBAT_SYS_ConnectDirect [IsNamedPolygon('F.Cu-VBAT_SYS')] p27: connectstyle=Direct reliefconductorwidth=0.254 reliefentries=4 polygonreliefangle="90 Angle" airgapwidth=0.254
PolygonConnect Polygon_F.Cu-3V3_DIGITAL_ConnectDirect [IsNamedPolygon('F.Cu-3V3_DIGITAL')] p28: connectstyle=Direct reliefconductorwidth=0.254 reliefentries=4 polygonreliefangle="90 Angle" airgapwidth=0.254
RoutingVias [All] p1: holewidth=0.711 width=1.27 viastyle="Through Hole" minholewidth=0.711 minwidth=1.27 maxholewidth=0.711 maxwidth=1.27
SilkToSilkClearance [All] p1: silktosilkclearance=0
SilkToSolderMaskClearance [IsPad] p1: minsilkscreentomaskgap=0 clearancetoexposedcopper=TRUE
SolderMaskExpansion [All] p1: expansion=0 istentingtop=FALSE
Width [All] p1: maxlimit=10 minlimit=0.254 preferedwidth=0.254 midlayer1_maxwidth=0.254 midlayer3_maxwidth=0.254 midlayer7_maxwidth=0.254 midlayer9_maxwidth=0.254 midlayer11_maxwidth=0.254 midlayer13_maxwidth=0.254 midlayer15_maxwidth=0.254 midlayer19_maxwidth=0.254 midlayer21_maxwidth=0.254 midlayer23_maxwidth=0.254 midlayer27_maxwidth=0.254 midlayer29_maxwidth=0.254 minimp=50.000000 maximp=50.000000 favimp=50.000000
27 further rules are at their usual default settings.

## Classes and differential pairs
pad class "Pad Class Clearance 2,3": H1-Un1 H2-Un1 H3-Un1 H4-Un1

## Components (designator, comment, footprint, x,y, rotation, side; value= is the part's Value field where it differs from the comment)
C1 "Comment" C_0402_1005Metric 20,34 r0 top value="100 nF 25 V X7R CGA2B3X7R1E104K050BB"
C2 "Comment" C_0402_1005Metric 48.5,38 r0 top value="100 nF 25 V X7R CGA2B3X7R1E104K050BB"
C3 "Comment" C_1210_3225Metric 69,50 r0 top value="22 uF 25 V X7R CGA6P3X7R1E226M250AB"
C4 "Comment" C_0402_1005Metric 57.8,45.97 r270 top value="100 nF 25 V X7R CGA2B3X7R1E104K050BB"
C5 "Comment" C_1210_3225Metric 69,22 r0 top value="22 uF 25 V X7R CGA6P3X7R1E226M250AB"
C6 "Comment" C_0402_1005Metric 57.8,17.97 r270 top value="100 nF 25 V X7R CGA2B3X7R1E104K050BB"
C7 "Comment" C_0603_1608Metric 74.4,10 r0 top value="2.2 uF 10 V X7R CGA3E1X7R1A225K080AC"
C8 "Comment" C_0603_1608Metric 74.9,6 r0 top value="2.2 uF 10 V X7R CGA3E1X7R1A225K080AC"
C9 "Comment" C_0603_1608Metric 16,33.25 r0 top value="100 nF 50 V X7R CGA3E2X7R1H104K080AA"
C10 "Comment" C_1210_3225Metric 34,34 r0 top value="4.7 uF 50 V X7R CGA6P3X7R1H475K250AB"
C11 "Comment" C_1210_3225Metric 49,46 r0 top value="4.7 uF 50 V X7R CGA6P3X7R1H475K250AB"
C12 "Comment" C_1210_3225Metric 49,18 r0 top value="4.7 uF 50 V X7R CGA6P3X7R1H475K250AB"
C13 "Comment" CP_Elec_6.3x7.7 47,28 r0 top value="100 uF 35 V hybrid EEH-ZK1V101XP"
C14 "Comment" C_1210_3225Metric 74,50 r0 top value="22 uF 25 V X7R CGA6P3X7R1E226M250AB"
C15 "Comment" C_1210_3225Metric 69,43 r0 top value="22 uF 25 V X7R CGA6P3X7R1E226M250AB"
C16 "Comment" C_1210_3225Metric 74,43 r0 top value="22 uF 25 V X7R CGA6P3X7R1E226M250AB"
C17 "Comment" C_1210_3225Metric 74,22 r0 top value="22 uF 25 V X7R CGA6P3X7R1E226M250AB"
C18 "Comment" C_1210_3225Metric 69,15 r0 top value="22 uF 25 V X7R CGA6P3X7R1E226M250AB"
C19 "Comment" C_1210_3225Metric 74,17.75 r0 top value="22 uF 25 V X7R CGA6P3X7R1E226M250AB"
C20 "Comment" C_0603_1608Metric 52.35,46 r90 top value="100 nF 50 V X7R CGA3E2X7R1H104K080AA"
C21 "Comment" C_0603_1608Metric 52.35,18 r90 top value="100 nF 50 V X7R CGA3E2X7R1H104K080AA"
D1 "Comment" D_SMB 14.5,26 r90 top value="SMBJ18A CANDIDATE"
F1 "Comment" Fuse_1206_3216Metric 13,31 r0 top value=0451008.MRL
H1 "Comment" MountingHole_M3_3.4_EVT 5,55 r0 top value=M3_CLEARANCE_NPTH_3.4
H2 "Comment" MountingHole_M3_3.4_EVT 82,55 r0 top value=M3_CLEARANCE_NPTH_3.4
H3 "Comment" MountingHole_M3_3.4_EVT 68,5 r0 top value=M3_CLEARANCE_NPTH_3.4
H4 "Comment" MountingHole_M3_3.4_EVT 5,5 r0 top value=M3_CLEARANCE_NPTH_3.4
J1 "Comment" Molex_43045-0213_MicroFit-2_Vertical 6,32 r0 top value=43045-0213
J2 "Comment" Molex_43045-1202_MicroFit-12_RA 81.08,20 r270 top value=43045-1202
L1 "Comment" Coilcraft_XAL7030_472 62.5,46 r180 top value=XAL7030-472MEC
L2 "Comment" Coilcraft_XAL7030_472 62.5,18 r180 top value=XAL7030-472MEC
NT1 "Comment" NetTie-2_SMD_Pad0.5mm 75.6,19.88 r0 top value="2-pad copper net tie NET_TIE_COPPER_REV_A"
NT2 "Comment" NetTie-2_SMD_Pad0.5mm 75.6,11.48 r180 top value="2-pad copper net tie NET_TIE_COPPER_REV_A"
NT3 "Comment" NetTie-2_SMD_Pad0.5mm 75.6,8 r0 top value="2-pad copper net tie NET_TIE_COPPER_REV_A"
Q1 "Comment" CSD18540Q5B_DNK 27,30 r0 top value=CSD18540Q5B
R1 "Comment" R_0402_1005Metric 56,41 r0 top value="100 kOhm 0.1% ERA-2AEB104X"
R2 "Comment" R_0402_1005Metric 58.5,41 r0 top value="35.7 kOhm 0.1% ERA-2AEB3572X"
R3 "Comment" R_0402_1005Metric 50.5,41 r0 top value="86.6 kOhm 0.1% ERA-2AEB8662X"
R4 "Comment" R_0402_1005Metric 53,39 r0 top value="0 ohm ERJ-2GE0R00X"
R5 "Comment" R_0402_1005Metric 55.5,39 r0 top value="0 ohm ERJ-2GE0R00X"
R6 "Comment" R_0402_1005Metric 48,41.5 r0 top value="100 kOhm 1% ERJ-2RKF1003X"
R7 "Comment" R_0402_1005Metric 50,13 r0 top value="86.6 kOhm 0.1% ERA-2AEB8662X"
R8 "Comment" R_0402_1005Metric 52.5,11 r0 top value="0 ohm ERJ-2GE0R00X"
R9 "Comment" R_0402_1005Metric 55,11 r0 top value="0 ohm ERJ-2GE0R00X"
R10 "Comment" R_0402_1005Metric 58,13 r0 top value="10 kOhm 1% ERJ-2RKF1002X"
R11 "Comment" R_0402_1005Metric 66,11 r0 top value="100 kOhm 1% ERJ-2RKF1003X"
R12 "Comment" R_0402_1005Metric 68.5,11 r0 top value="10 kOhm 1% ERJ-2RKF1002X"
R13 "Comment" R_0402_1005Metric 74.6,3.5 r0 top value="4.7 kOhm 1% ERJ-2RKF4701X"
R14 "Comment" R_0402_1005Metric 74.6,2 r0 top value="4.7 kOhm 1% ERJ-2RKF4701X"
R15 "Comment" R_0402_1005Metric 61,39.5 r0 top value="10 kOhm 1% ERJ-2RKF1002X"
RSH1 "Comment" Vishay_WSK2512_4T_T1.19mm 36.5,29 r0 top value=WSK2512R0100FEA
TP1 "Comment" TestPoint_DFT_1.7mm_NoPaste 25,4 r0 top value="TP_VBAT_PROTECTED DFT_PAD_1P70_NOPASTE_REV_A"
TP2 "Comment" TestPoint_DFT_1.7mm_NoPaste 27.54,4 r0 top value="TP_SHUNT_SRC DFT_PAD_1P70_NOPASTE_REV_A"
TP3 "Comment" TestPoint_DFT_1.7mm_NoPaste 30.08,4 r0 top value="TP_SHUNT_LOAD DFT_PAD_1P70_NOPASTE_REV_A"
TP4 "Comment" TestPoint_DFT_1.7mm_NoPaste 32.62,4 r0 top value="TP_3V8 DFT_PAD_1P70_NOPASTE_REV_A"
TP5 "Comment" TestPoint_DFT_1.7mm_NoPaste 35.16,4 r0 top value="TP_PG_3V8 DFT_PAD_1P70_NOPASTE_REV_A"
TP6 "Comment" TestPoint_DFT_1.7mm_NoPaste 37.7,4 r0 top value="TP_PWR_GOOD DFT_PAD_1P70_NOPASTE_REV_A"
TP7 "Comment" TestPoint_DFT_1.7mm_NoPaste 40.24,4 r0 top value="TP_1V8 DFT_PAD_1P70_NOPASTE_REV_A"
TP8 "Comment" TestPoint_DFT_1.7mm_NoPaste 42.78,4 r0 top value="TP_FAULT DFT_PAD_1P70_NOPASTE_REV_A"
TP9 "Comment" TestPoint_DFT_1.7mm_NoPaste 45.32,4 r0 top value="TP_SCL DFT_PAD_1P70_NOPASTE_REV_A"
TP10 "Comment" TestPoint_DFT_1.7mm_NoPaste 47.86,4 r0 top value="TP_SDA DFT_PAD_1P70_NOPASTE_REV_A"
U1 "Comment" TI_DBV0006A_SOT23-6 20,30 r0 top value=LM74700QDBVRQ1
U2 "Comment" TI_DGS0010A_VSSOP10 44,37 r0 top value=INA226AIDGSR
U3 "Comment" LMR60440_RAK0009A 55,46 r90 top value=LMR604403SRAKR
U4 "Comment" LMR60440_RAK0009A 55,18 r90 top value=LMR604403SRAKR
U5 "Comment" TI_DBV0005A_SOT23-5 74.4,14 r0 top value=TPS7A2018PDBVR

## Footprints (in the part's own frame and the unit in brackets; to place one, negate y for a bottom-side part, rotate by r counter-clockwise, add the part's x,y. Pads: shape width x height; smd on the part's side, far side on the other; paste and mask are expansions set on the pad)
C_0402_1005Metric [mm]
  rrect25% 0.56x0.62 smd paste-0.62 mask-0.62: 1(-0.48,0) 2(0.48,0)
  F.SilkS lines w0.254: -0.108,-0.36 0.108,-0.36 ; -0.108,0.36 0.108,0.36
  F.CrtYd lines w0.254: -0.91,-0.46 0.91,-0.46 0.91,0.46 -0.91,0.46 -0.91,-0.46
C_0603_1608Metric [mm]
  rrect25% 0.9x0.95 smd paste-0.95 mask-0.95: 1(-0.775,0) 2(0.775,0)
  F.SilkS lines w0.254: -0.141,-0.51 0.141,-0.51 ; -0.141,0.51 0.141,0.51
  F.CrtYd lines w0.254: -1.48,-0.73 1.48,-0.73 1.48,0.73 -1.48,0.73 -1.48,-0.73
C_1210_3225Metric [mm]
  rrect22% 1.15x2.7 smd paste-2.7 mask-2.7: 1(-1.475,0) 2(1.475,0)
  F.SilkS lines w0.254: -0.711,-1.36 0.711,-1.36 ; -0.711,1.36 0.711,1.36
  F.CrtYd lines w0.254: -2.3,-1.6 2.3,-1.6 2.3,1.6 -2.3,1.6 -2.3,-1.6
Coilcraft_XAL7030_472 [mm]
  rect 1.58x6.5 smd paste-6.5 mask-6.5: 1(2.26,0) 2(-2.26,0)
  F.SilkS region: 3.9,3.3 3.3,3.9 3.9,3.9
  F.CrtYd lines w0.254: 4,4 -4,4 -4,-4 4,-4 4,4
CP_Elec_6.3x7.7 [mm]
  rrect16% 3.5x1.6 smd paste-3.5 mask-3.5: 1(-2.7,0) 2(2.7,0)
  F.SilkS lines w0.254: -4.437,1.847 -3.65,1.847 ; -4.044,1.454 -4.044,2.241 ; -3.41,-1.06 -3.41,-2.346 -2.346,-3.41 3.41,-3.41 3.41,-1.06 ; -3.41,1.06 -3.41,2.346 -2.346,3.41 3.41,3.41 3.41,1.06
  F.CrtYd lines w0.254: -4.7,-1.05 -3.55,-1.05 -3.55,-2.4 -2.4,-3.55 3.55,-3.55 3.55,-1.05 4.7,-1.05 4.7,1.05 3.55,1.05 3.55,3.55 -2.4,3.55 -3.55,2.4 -3.55,1.05 -4.7,1.05 -4.7,-1.05
CSD18540Q5B_DNK [mm]
  rect 1.372x0.71 smd paste-1.372 mask-1.372: 1(2.77,-1.905) 2(2.77,-0.635) 3(2.77,0.635) 4(2.77,1.905)
  rect 4.44x0.71 smd paste-4.44 mask-4.44: 5(-1.236,1.905) 6(-1.236,0.635) 7(-1.236,-0.635) 8(-1.236,-1.905)
  rect 3.85x0.56 smd paste-3.85 mask-3.85: 5(-0.941,-1.27) 5(-0.941,0) 5(-0.941,1.27)
  rect 0.766x0.508 on Mid13 paste-0.766 mask-0.766: Un1(-2.91,1.905) Un2(-2.91,0.635) Un3(-2.91,-0.635) Un4(-2.91,-1.905)
  rect 1.294x0.746 on Mid13 paste-1.294 mask-1.294: Un5(-1.594,1.569) Un6(-1.594,0.523) Un7(-1.594,-0.523) Un8(-1.594,-1.569) Un9(0.05,1.569) Un10(0.05,0.523) Un11(0.05,-0.523) Un12(0.05,-1.569)
  rect 1.072x0.562 on Mid13 paste-1.072 mask-1.072: Un13(2.758,1.905) Un14(2.758,0.635) Un15(2.758,-0.635) Un16(2.758,-1.905)
  F.SilkS region: 3.12,-2.62 2.62,-2.62 3.12,-2.12
  F.SilkS lines w0.254: -3.12,-2.62 2.45,-2.62 ; -3.12,2.62 3.12,2.62
  F.CrtYd lines w0.254: -3.706,-2.75 3.706,-2.75 3.706,2.75 -3.706,2.75 -3.706,-2.75
D_SMB [mm]
  rrect11% 2.5x2.3 smd paste-2.5 mask-2.5: 1(-2.15,0) 2(2.15,0)
  F.SilkS lines w0.254: 2.15,2.15 -3.66,2.15 -3.66,-2.15 2.15,-2.15
  F.CrtYd lines w0.254: -3.65,2.25 -3.65,-2.25 3.65,-2.25 3.65,2.25 -3.65,2.25
Fuse_1206_3216Metric [mm]
  rrect20% 1.25x1.75 smd paste-1.75 mask-1.75: 1(-1.4,0) 2(1.4,0)
  F.SilkS lines w0.254: -0.602,-0.91 0.602,-0.91 ; -0.602,0.91 0.602,0.91
  F.CrtYd lines w0.254: -2.28,-1.13 2.28,-1.13 2.28,1.13 -2.28,1.13 -2.28,-1.13
LMR60440_RAK0009A [mm]
  rrect29% 0.6x0.345 smd paste-0.6 mask-0.6: 1(-0.9,0.927) 3(-0.9,-0.927)
  rrect40% 0.25x0.695 smd paste-0.695 mask-0.695: 1(-0.725,1.102) 3(-0.725,-1.102)
  rrect36% 2.5x0.55 smd paste-2.5 mask-2.5: 2(0,0)
  rrect40% 0.25x0.65 smd paste-0.65 mask-0.65: 4(-0.075,-1.125) 9(-0.075,1.125)
  rrect33% 0.3x0.55 smd paste-0.55 mask-0.55: 5(0.7,-1.175) 8(0.7,1.175)
  rrect50% 0.7x0.2 smd paste-0.7 mask-0.7: 5(0.9,-1) 8(0.9,1)
  rrect40% 0.65x0.25 smd paste-0.65 mask-0.65: 6(0.875,-0.525) 7(0.875,0.525)
  rrect29% 0.56x0.345 on Mid13 paste-0.56 mask-0.56: Un1(-0.92,0.927) Un2(-0.92,-0.927)
  rrect48% 0.21x0.695 on Mid13 paste-0.695 mask-0.695: Un3(-0.745,1.102) Un4(-0.745,-1.102)
  rrect24% 1.1x0.41 on Mid13 paste-1.1 mask-1.1: Un5(-0.65,0)
  rect 0.01x0.01 on Mid1 paste-0.01 mask-0.01: Un6(0,0)
  rrect33% 1.1x0.3 on Mid13 paste-1.1 mask-1.1: Un7(0.65,0)
  F.Mask region: -0.027,0.214 0.037,0.161 0.069,0.15 1.15,0.15 1.2,0.1 1.2,-0.1 1.15,-0.15 0.069,-0.15 0.037,-0.161 -0.027,-0.214 -0.059,-0.225 -1.15,-0.225 -1.2,-0.175 -1.2,0.175 -1.15,0.225 -0.059,0.225
  F.SilkS lines w0.254: -0.72,1.48 -0.9,1.48 -1,1.38
  F.CrtYd lines w0.254: -1.5,1.7 1.5,1.7 1.5,-1.7 -1.5,-1.7 -1.5,1.7
Molex_43045-0213_MicroFit-2_Vertical [mm]
  rrect20% 1.5x1.5 hole 1.02 paste-2539.97 mask-1.5: 1(0,-3)
  round 1.5 hole 1.02 paste-2539.97 mask-1.5: 2(0,0)
  round 0.94 hole 0.94 paste-2539.97 mask-0.94: Un1(-3,0) Un2(3,0)
  F.SilkS region: 0,-4.7 -0.75,-3.95 0.75,-3.95
  F.CrtYd lines w0.254: -3.83,-7.3 3.83,-7.3 3.83,3.8 -3.83,3.8 -3.83,-7.3
Molex_43045-1202_MicroFit-12_RA [mm]
  rrect20% 1.5x1.5 hole 1.02 paste-2539.97 mask-1.5: 1(0,0)
  round 1.5 hole 1.02 paste-2539.97 mask-1.5: 2(3,0) 3(6,0) 4(9,0) 5(12,0) 6(15,0) 7(0,-3) 8(3,-3) 9(6,-3) 10(9,-3) 11(12,-3) 12(15,-3)
  round 3 hole 3 paste-2539.97 mask-3: Un1(2.15,4.32) Un2(12.85,4.32)
  F.CrtYd lines w0.254: 19.08,-4.25 19.08,9.42 -4.08,9.42 -4.08,-4.25 19.08,-4.25
MountingHole_M3_3.4_EVT [mm]
  round 3.4 hole 3.4 paste-2539.97 mask-3.4: Un1(0,0)
  Dwgs.User circle w0.254: c0,0 r4
  F.CrtYd circle w0.254: c0,0 r5
NetTie-2_SMD_Pad0.5mm [mm]
  round 0.5 smd paste-0.5 mask-0.5: 1(-0.5,0) 2(0.5,0)
  F.Cu region: 0.5,-0.25 -0.5,-0.25 -0.5,0.25 0.5,0.25
R_0402_1005Metric [mm]
  rrect25% 0.54x0.64 smd paste-0.64 mask-0.64: 1(-0.51,0) 2(0.51,0)
  F.SilkS lines w0.254: -0.154,-0.38 0.154,-0.38 ; -0.154,0.38 0.154,0.38
  F.CrtYd lines w0.254: -0.93,-0.47 0.93,-0.47 0.93,0.47 -0.93,0.47 -0.93,-0.47
TestPoint_DFT_1.7mm_NoPaste [mm]
  round 1.7 smd paste-1.7 mask-1.7: 1(0,0)
  F.CrtYd circle w0.254: c0,0 r1.15
TI_DBV0005A_SOT23-5 [mm]
  rrect17% 1.1x0.6 smd paste-1.1 mask-1.1: 1(-1.3,0.95) 2(-1.3,0) 3(-1.3,-0.95) 4(1.3,-0.95) 5(1.3,0.95)
  F.SilkS region: -1.48,1.08 -1.68,1.28 -1.28,1.28
  F.CrtYd lines w0.254: -2.1,-1.78 2.1,-1.78 2.1,1.78 -2.1,1.78 -2.1,-1.78
TI_DBV0006A_SOT23-6 [mm]
  rrect17% 1.1x0.6 smd paste-1.1 mask-1.1: 1(-1.3,0.95) 2(-1.3,0) 3(-1.3,-0.95) 4(1.3,-0.95) 5(1.3,0) 6(1.3,0.95)
  F.SilkS region: -1.48,1.08 -1.68,1.28 -1.28,1.28
  F.CrtYd lines w0.254: -2.1,-1.78 2.1,-1.78 2.1,1.78 -2.1,1.78 -2.1,-1.78
TI_DGS0010A_VSSOP10 [mm]
  rrect33% 1.45x0.3 smd paste-1.45 mask-1.45: 1(-2.2,1) 2(-2.2,0.5) 3(-2.2,0) 4(-2.2,-0.5) 5(-2.2,-1) 6(2.2,-1) 7(2.2,-0.5) 8(2.2,0) 9(2.2,0.5) 10(2.2,1)
  F.SilkS region: -2.3,1.18 -2.5,1.38 -2.1,1.38
  F.CrtYd lines w0.254: -3.18,-1.5 3.18,-1.5 3.18,1.5 -3.18,1.5 -3.18,-1.5
Vishay_WSK2512_4T_T1.19mm [mm]
  rect 2.29x2.03 smd paste-2.29 mask-2.29: 1(-2.985,0.635) 2(2.985,-0.635)
  rect 1.7x0.76 smd paste-1.7 mask-1.7: 3(-3.28,-1.27) 4(3.28,1.27)
  F.SilkS region: -3.2,1.45 -3.8,1.45 -3.5,1.75
  F.CrtYd lines w0.254: -4.38,-1.9 4.38,-1.9 4.38,1.9 -4.38,1.9 -4.38,-1.9

## Part data
C1 C2 C4 C6: library part C_0402_1005Metric, "DIONEA_PCB_PWR_REV_A"
C3 C5 C10 C11 C12 C14 C15 C16 C17 C18 C19: library part C_1210_3225Metric, "DIONEA_PCB_PWR_REV_A"
C7 C8 C9 C20 C21: library part C_0603_1608Metric, "DIONEA_PCB_PWR_REV_A"
C13: library part CP_Elec_6.3x7.7, "DIONEA_PCB_PWR_REV_A"
D1: library part D_SMB, "DIONEA_PCB_PWR_REV_A"
F1: library part Fuse_1206_3216Metric, "DIONEA_PCB_PWR_REV_A"
H1 H2 H3 H4: library part MountingHole_M3_3.4_EVT, "DIONEA_PCB_PWR_EVT_MOUNT", Description="EVT DIM-003 M3 mounting hole"
J1: library part Molex_43045-0213_MicroFit-2_Vertical, "DIONEA_PCB_PWR_REV_A"
J2: library part Molex_43045-1202_MicroFit-12_RA, "DIONEA_PCB_PWR_REV_A"
L1 L2: library part Coilcraft_XAL7030_472, "DIONEA_PCB_PWR_REV_A"
NT1 NT2 NT3: library part NetTie-2_SMD_Pad0.5mm, "DIONEA_PCB_PWR_REV_A"
Q1: library part CSD18540Q5B_DNK, "DIONEA_PCB_PWR_REV_A"
R1 R2 R3 R4 R5 R6 R7 R8 R9 R10 R11 R12 R13 R14 R15: library part R_0402_1005Metric, "DIONEA_PCB_PWR_REV_A"
RSH1: library part Vishay_WSK2512_4T_T1.19mm, "DIONEA_PCB_PWR_REV_A"
TP1 TP2 TP3 TP4 TP5 TP6 TP7 TP8 TP9 TP10: library part TestPoint_DFT_1.7mm_NoPaste, "DIONEA_PCB_PWR_REV_A"
U1: library part TI_DBV0006A_SOT23-6, "DIONEA_PCB_PWR_REV_A"
U2: library part TI_DGS0010A_VSSOP10, "DIONEA_PCB_PWR_REV_A"
U3 U4: library part LMR60440_RAK0009A, "DIONEA_PCB_PWR_REV_A"
U5: library part TI_DBV0005A_SOT23-5, "DIONEA_PCB_PWR_REV_A"

## Via types
v1: diameter 0.6, hole 0.3, F.Cu to B.Cu, tented both sides, 267 vias

## Nets (pads, with @x,y where several pads share a name; then routed paths per layer and width w, separated by ;. In a path a pad name is that pad's centre, name@x,y a point inside that pad or via, vN(x,y) a via of type N, cw(c..) or ccw(c..) an arc to the next point about the centre after c; other vN are vias at no path point)
1V8_MIC: C8.1 J2.5 TP7.1 U5.5 | length 75.5
  F.Cu w0.5: TP7.1@40.24,4 43.353,7.113 v1(43.353,8.061) ; v1(60.496,23.439) 64.528,23.439 v1(66.282,21.686) ; C8.1@74.125,6 74.125,5.947 v1(74.926,5.146) ; v1(74.884,15.685) 74.965,15.685 U5.5@75.7,14.95
  B.Cu w0.5: v1(43.353,8.061) 44.219,8.927 44.219,14.61 53.048,23.439 v1(60.496,23.439) ; v1(66.282,21.686) 72.282,15.685 v1(74.884,15.685) 74.884,15.448 77.832,12.5 78.325,12.5 79.58,11.245 79.58,9.5 J2.5@81.08,8 82.287,6.793 82.287,4.433 80.895,3.042 77.03,3.042 v1(74.926,5.146)
3V3_DIGITAL: C2.1 C5.1 C7.1 C17.1 C18.1 C19.1 J2.3 L2.2 R10.1 R12.1 R13.1 R14.1 R15.2 U2.6 U4.6 U5.1 | length 130.3
  F.Cu w0.2: U2.6@46.2,36 v1(47.7,36) ; U4.6@55.585,18.875 v1(55.585,20.8) ; v1(57.49,12.1) R10.1@57.49,13
  F.Cu w0.25: v1(47.7,36) 48.2,36.5 C2.1@48.2,37.8 ; v1(61.51,38.6) R15.2@61.51,39.5 ; v1(64.5,25) 66.4,23.1 C5.1@67.3,23.1 ; 66.55,15.75 66.35,15.55 66.35,15.45 66.25,15.35 66.25,15.25 65.35,14.35 65.35,13.25 65.25,13.15 65.25,13.05 65.15,12.95 65.15,12.75 65.05,12.65 65.05,12.55 64.95,12.45 64.95,12.35 64.85,12.25 64.85,10.55 65.05,10.35 66.25,10.35 66.45,10.15 67.15,10.15 ; C5.1@67.95,23.15 68.75,23.15 69.35,23.75 71.15,23.75 C17.1@72.55,22.35 ; C7.1@73.625,9.7 73.2,9.2 73.2,3.5 R13.1@74.09,3.5 R14.1@74.09,2
  F.Cu w0.601: U5.1@73.1,14.95 U5.1@73.1,15.002
  F.Cu w1: v1(57.49,12.1) 59.642,9.947 67.454,9.947 67.99,10.483 ; C5.1@67.3,23.1 67.525,22.875 C5.1@67.525,22 67.525,21.512 66.696,20.684 65.086,20.684 64.76,21.01 L2.2@64.76,18 67.525,15.235 C18.1@67.525,15 ; R12.1@67.99,11 67.99,10.483 ; v1(72,19.9) v1(73,19.9) ; C17.1@72.525,22 C19.1@72.525,17.75 73.1,17.175 U5.1@73.1,15.002 ; 73.2,9.2 C7.1@73.2,9.762 ; C7.1@73.625,10 73.387,9.762 C7.1@73.2,9.762 ; 67.99,10.483 68.711,9.762 C7.1@73.2,9.762
  B.Cu w0.2: v1(55.585,20.8) v1(57.49,12.1)
  B.Cu w0.25: v1(47.7,36) 61.51,36 ; v1(61.51,38.6) 61.51,36 ; v1(64.5,25) 64.5,33 61.51,36
  B.Cu w1.2: v1(72,19.9) 76.5,22 82.95,22 82.95,15.5 J2.3@81.08,14
3V8_MODEM: C3.1 C14.1 C15.1 C16.1 J2.1 L1.2 R1.1 TP4.1 | length 143.1
  F.Cu w0.25: R1.1@55.55,41.15 56.05,41.65 56.95,41.65 57.35,42.05 60.35,42.05 60.45,42.15 61.95,42.15 62.15,42.35 63.55,42.35
  F.Cu w0.5: 72.525,40.4 C16.1@72.525,43 ; C14.1@72.525,50 72.525,52.6
  F.Cu w1: TP4.1@32.62,4 34.172,2.448 48.516,2.448 49.412,3.343 49.412,7.012 48.322,8.102 v1(47.15,8.102) ; L1.2@64.76,43 L1.2@64.76,46 L1.2@64.76,48 ; J2.1@81.08,20 J2.1@81.08,20.58
  F.Cu w3: L1.2@64.76,43 C15.1@67.525,43 67.525,39.8 72.525,39.8 ; L1.2@64.76,48 C3.1@67.525,50 67.525,53.2 72.525,53.2 72.525,52.6 ; 72.525,40.4 72.525,39.8 ; J2.1@81.08,20.58 83.5,23 83.5,35.8 79.5,39.8 72.525,39.8
  B.Cu w0.3: 70.857,18.526 79.607,18.526 J2.1@81.08,20
  B.Cu w1: v1(47.15,8.102) 47.15,16.154 53.326,22.331 65.51,22.331 65.867,22.687 66.696,22.687 70.857,18.526
BOOT_3V3: C6.1 U4.4 | length 1.6
  F.Cu w0.5: 56.45,18.05 56.9,18.05 57.1,18.45 57.49,18.45 C6.1@57.8,18.45
BOOT_3V8: C4.1 U3.4 | length 1.6
  F.Cu w0.5: 56.45,46.05 56.9,46.05 57.1,46.45 57.49,46.45 C4.1@57.8,46.45
EN_AUX: J2.10 R11.1 U5.3 | length 15.6
  F.Cu w0.25: R11.1@65.49,11 65.49,12.004 66.536,13.05 U5.3@73.1,13.05 73.769,13.05 v1(74.172,13.453)
  B.Cu w0.25: v1(74.172,13.453) 74.172,13.004 76.353,10.823 77.903,10.823 J2.10@78.08,11
EN_MODEM: J2.9 R6.1 U3.9 | length 75.9
  F.Cu w0.2: v1(53.175,47.8) 53.175,45.925 U3.9@53.875,45.925
  F.Cu w0.25: v1(46.684,41.435) 47.425,41.435 R6.1@47.49,41.5
  B.Cu w0.25: v1(46.684,41.435) 46.684,43.122 51.361,47.8 v1@52.936,47.8 ; v1(53.175,47.8) v1@52.936,47.8 ; J2.9@78.08,14 79.188,12.892 83.424,12.892 87.491,16.959 87.491,18.832 56.367,49.956 54.14,49.956 52.936,48.752 v1@52.936,47.8
FAULT: J2.8 R12.2 TP8.1 U2.3 | length 78.3
  F.Cu w0.2: U2.3@41.8,37 42.7,37 v1(43.2,37.8)
  F.Cu w0.25: TP8.1@42.78,4 v1(42.78,5.368) 46.363,8.951 55.585,8.951 v1(56.287,9.653) ; R12.2@69.01,11 v1(69.648,11.638) 73.243,11.638 74.799,13.194 74.799,13.407 75.356,13.963 76.014,13.963 78.08,16.03 J2.8@78.08,17
  B.Cu w0.25: v1(42.78,5.368) 41.823,6.325 41.823,36.423 v1(43.2,37.8) ; v1(56.287,9.653) 57.396,10.762 68.772,10.762 v1(69.648,11.638)
FB_3V8: R1.2 R2.1 U3.6 | length 13.1
  F.Cu w0.2: U3.6@55.585,46.875 v1(55.585,48.8) ; v1(56.51,40.1) R1.2@56.51,41
  F.Cu w0.25: R1.2@56.51,41 R2.1@57.99,41
  B.Cu w0.2: v1(55.585,48.8) v1(56.51,40.1)
GND_DIGITAL: J2.4 NT2.1
GND_MIC: J2.6 NT3.1 | length 11.2
  F.Cu w0.5: v1(73.85,7.05) v1(74.547,7.447) NT3.1@75.1,8
  B.Cu w0.5: v1(73.85,7.05) 74.55,6.82 ; v1(74.547,7.447) 74.547,6.817 77.585,3.779 79.859,3.779 J2.6@81.08,5
GND_MODEM: J2.2 NT1.1
  other v1: 74.15,16.45 74.4,17.25 73.85,17.85